# Altium PCB NewTrackerBoard.PcbDoc (part 1 of 4)
Units mm, origin at the board's own origin, x right, y up, seen from the top; angles counter-clockwise.
Board outline 47 x 47 mm, 4 copper layers (L1 (SIG), L2 (GND), L3 (GND), L4 (SIG + PWR)), stack 1.566 mm thick; 77 components, 57 nets, 308 pads, 297 vias.
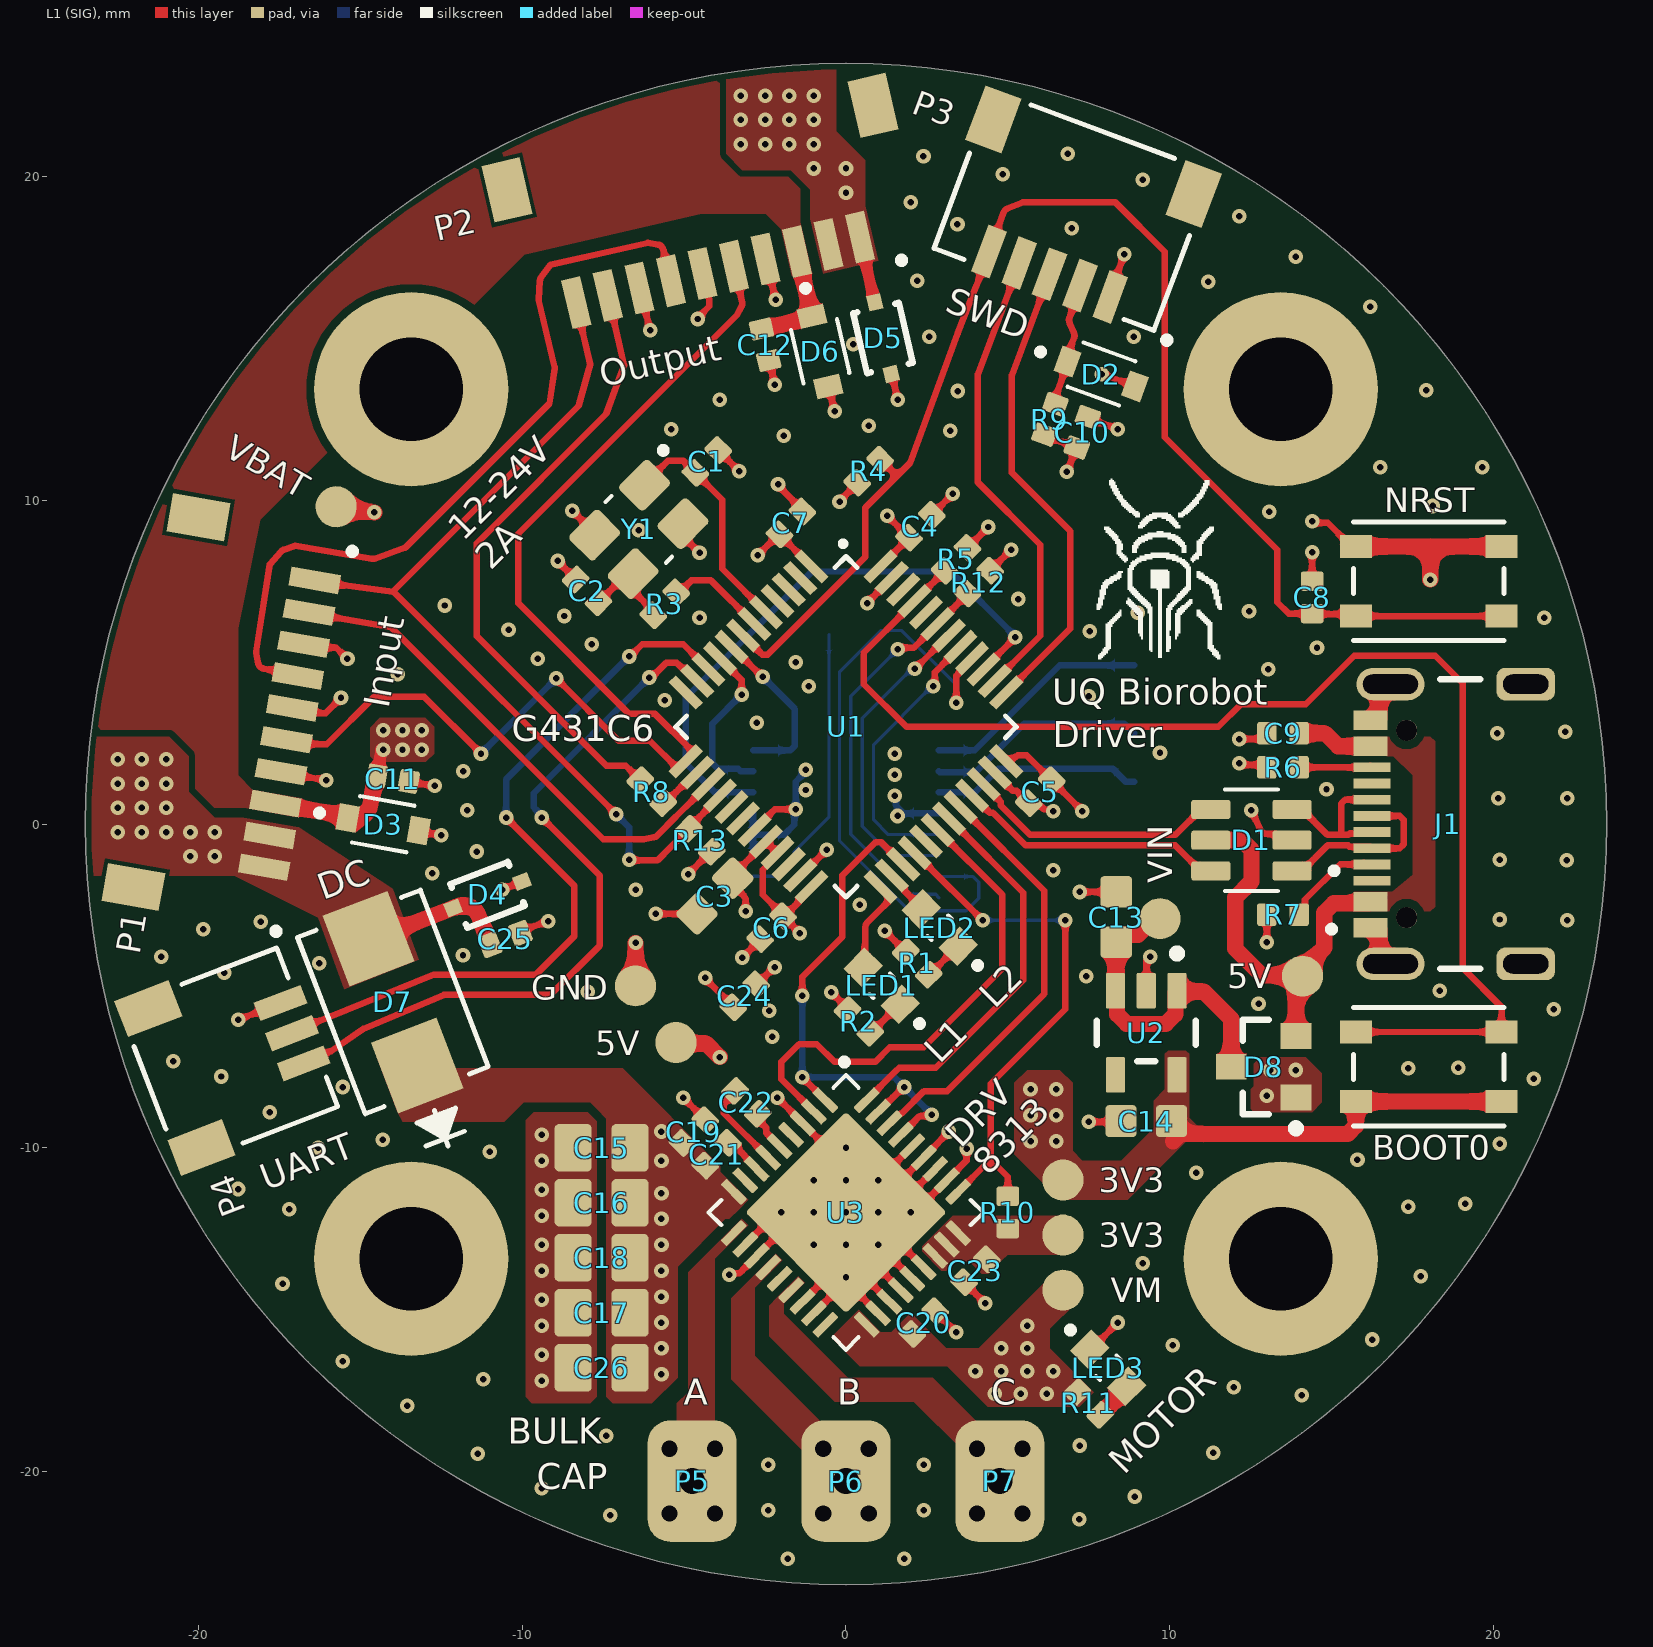
[diagram p0: L1 (SIG) view]
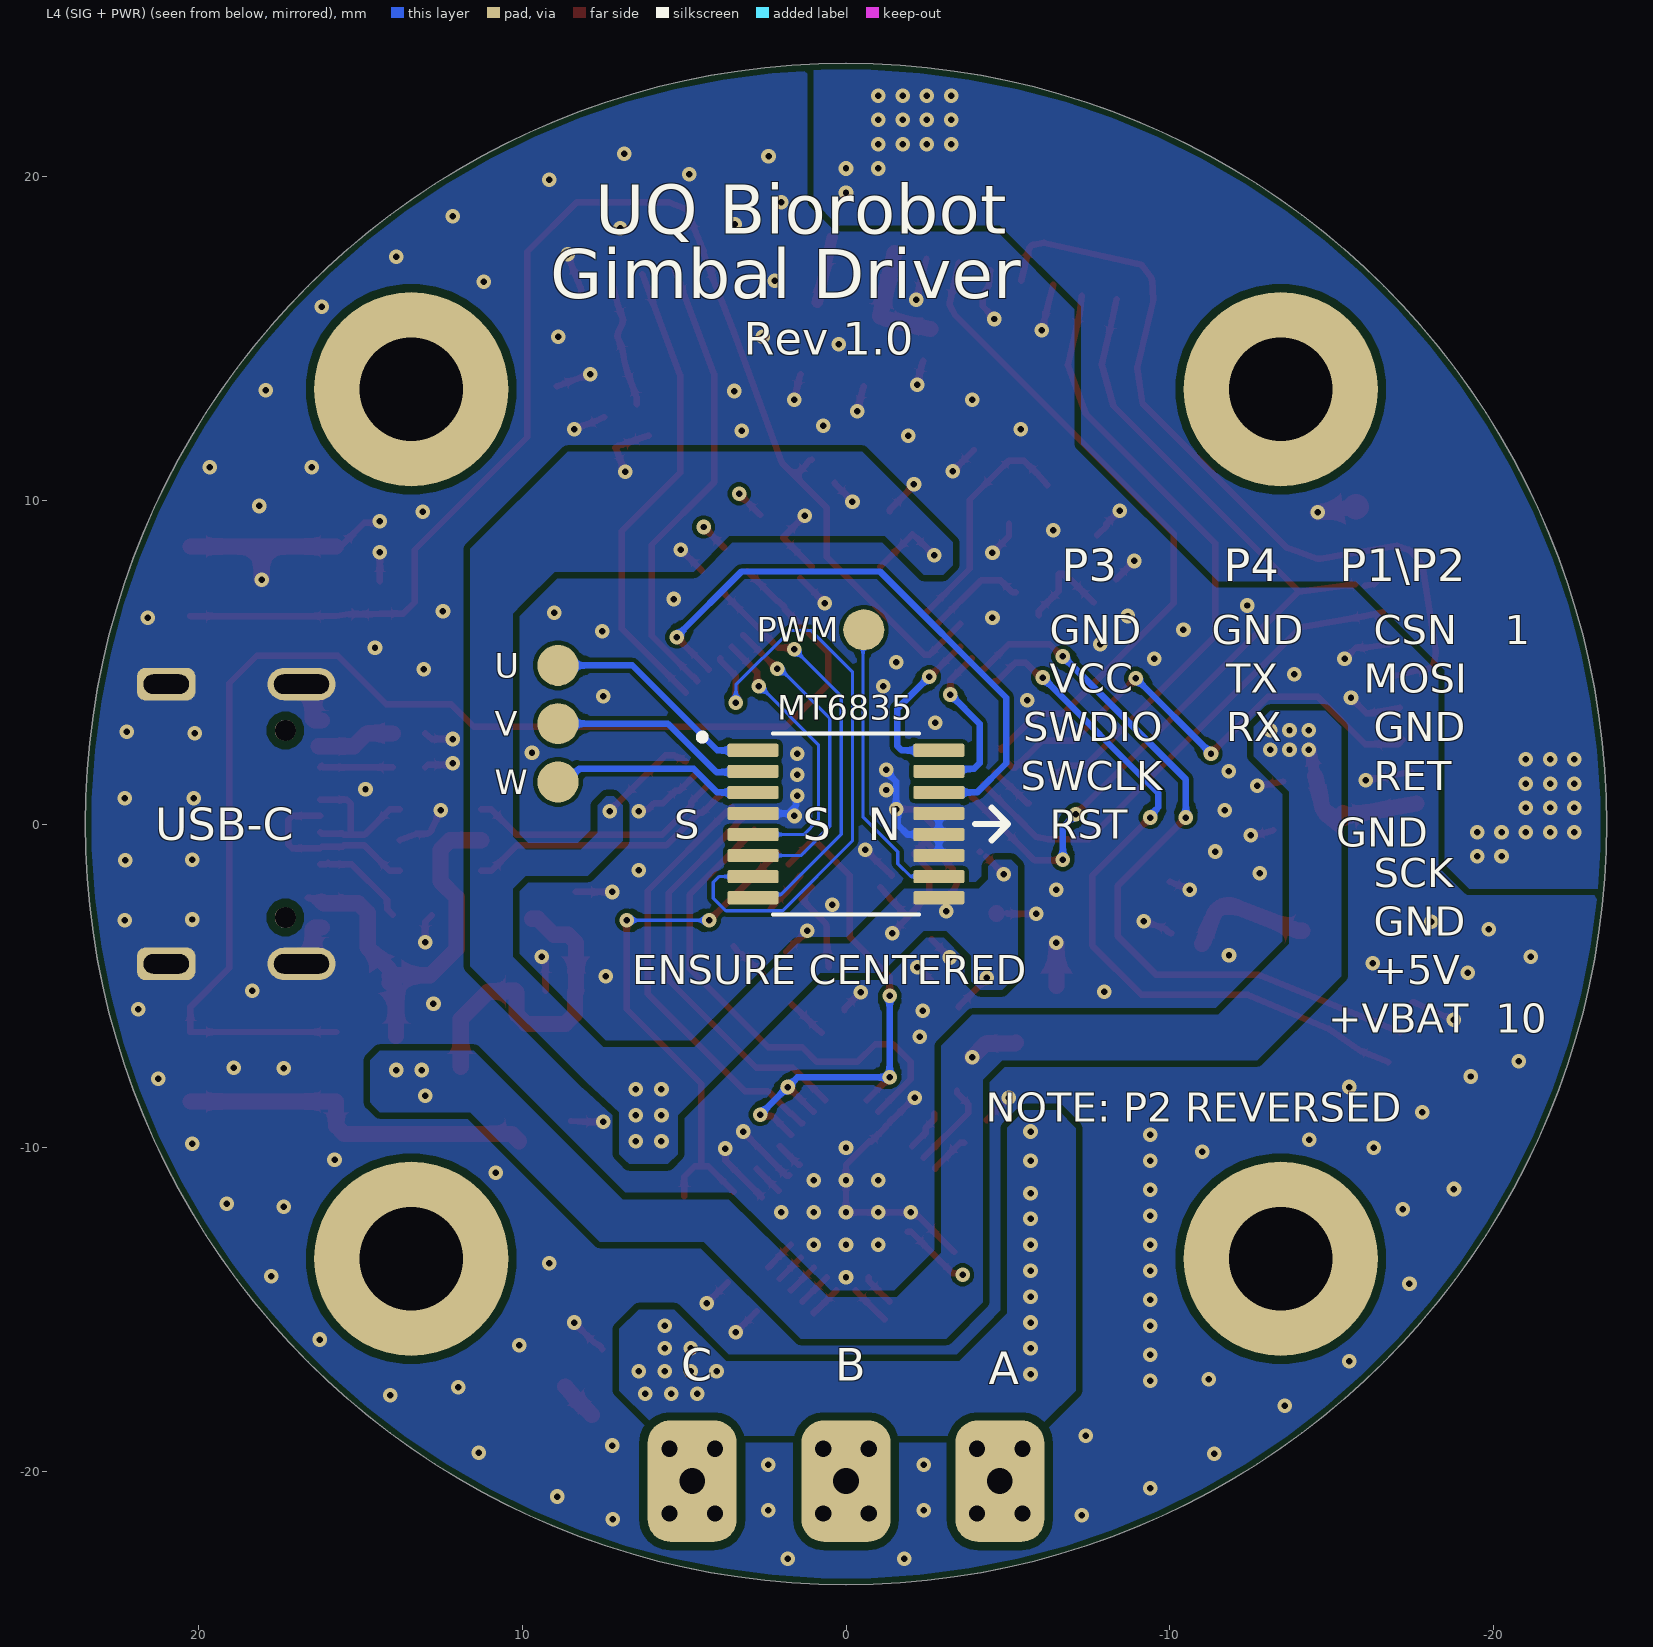
[diagram p1: L4 (SIG + PWR) view, seen from below]
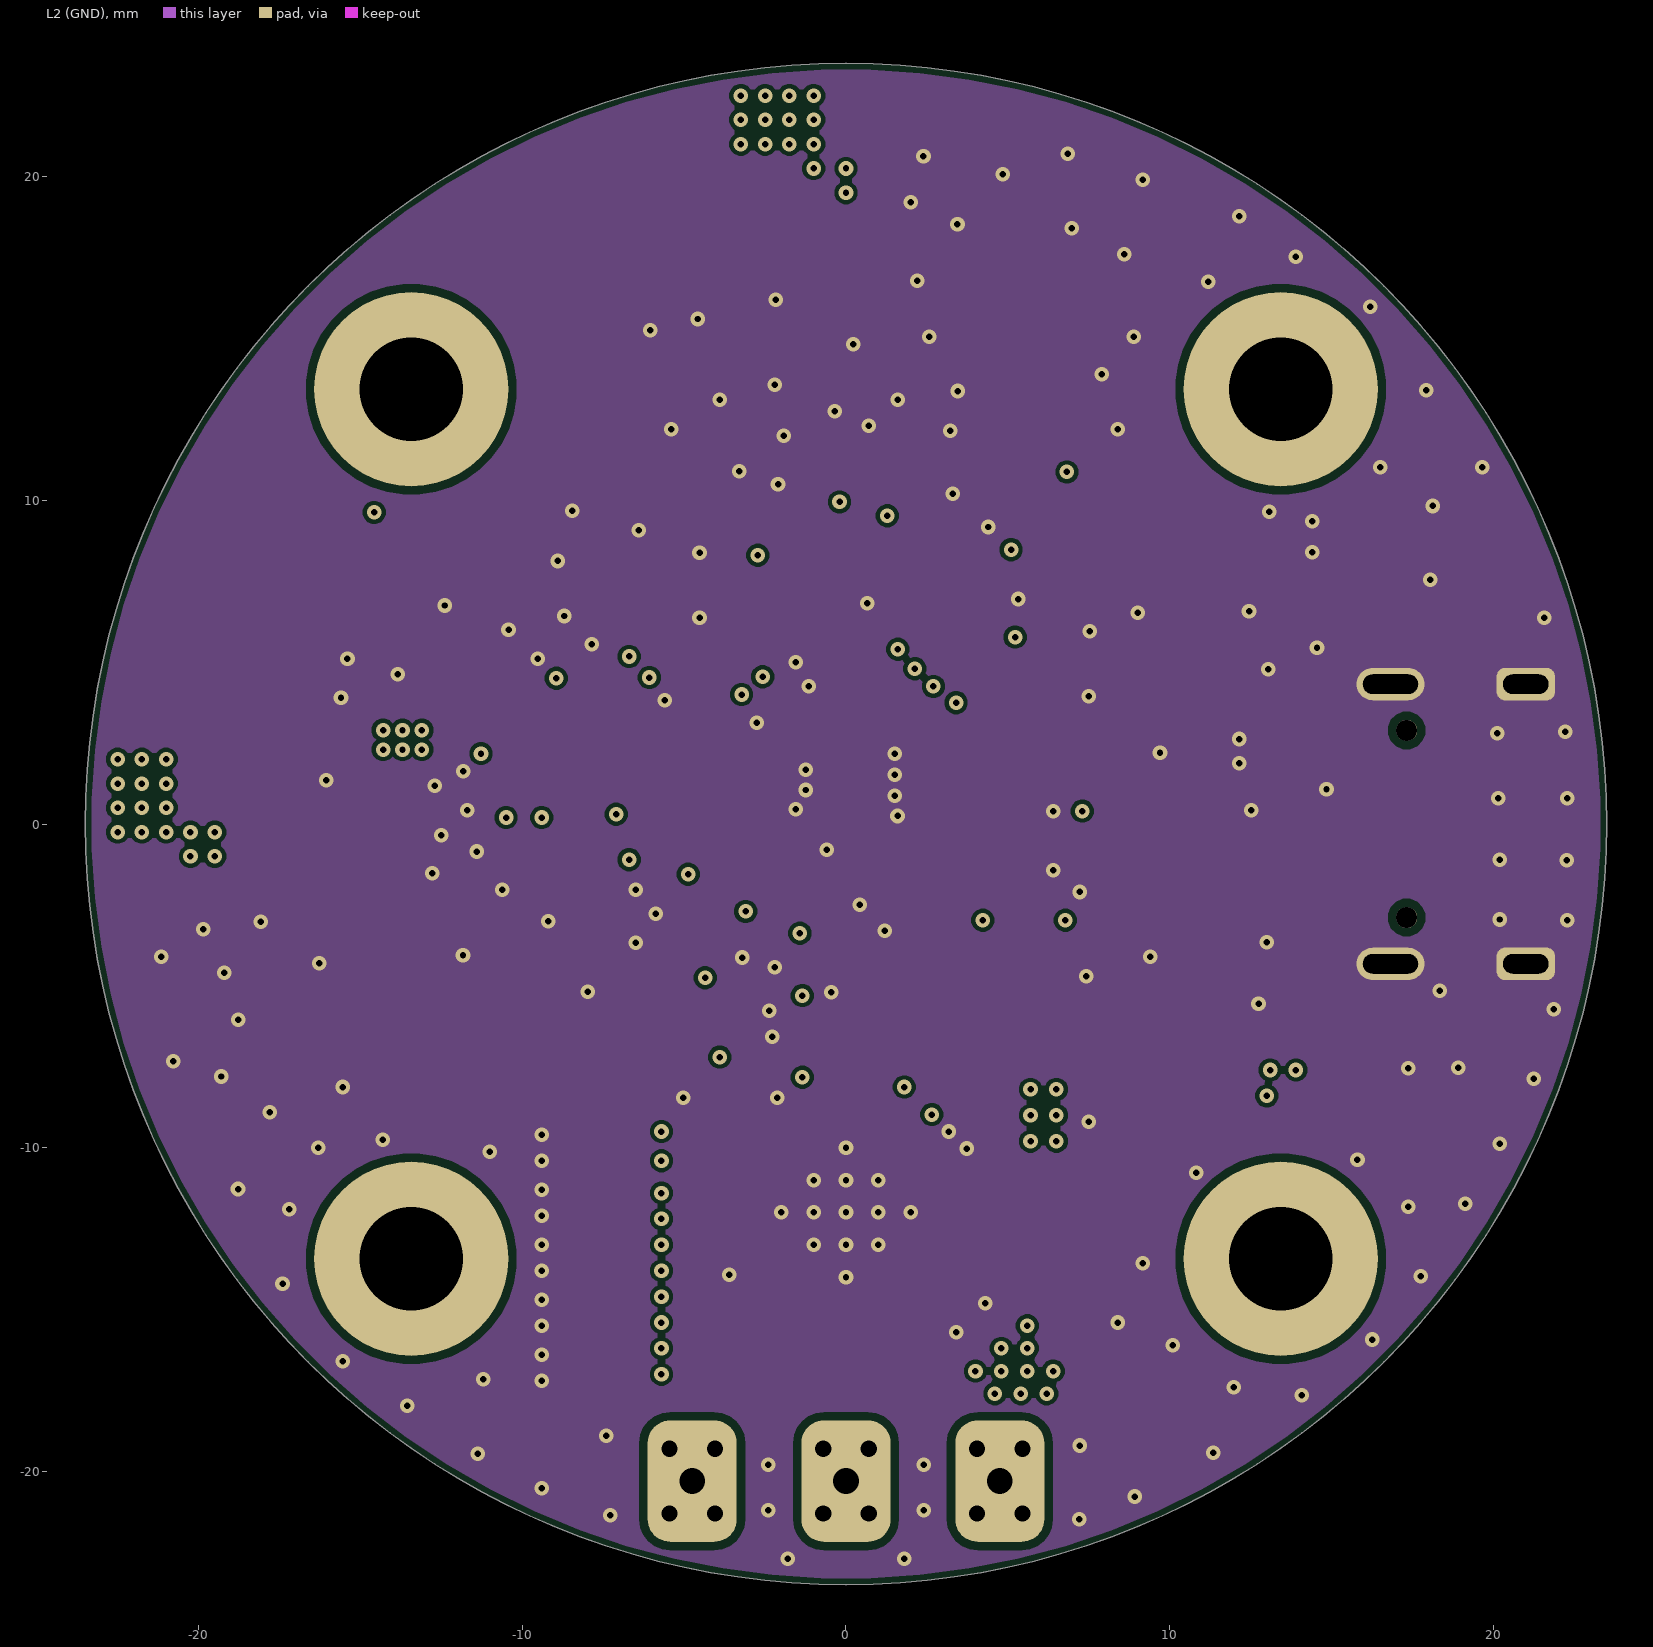
[diagram p2: L2 (GND)]
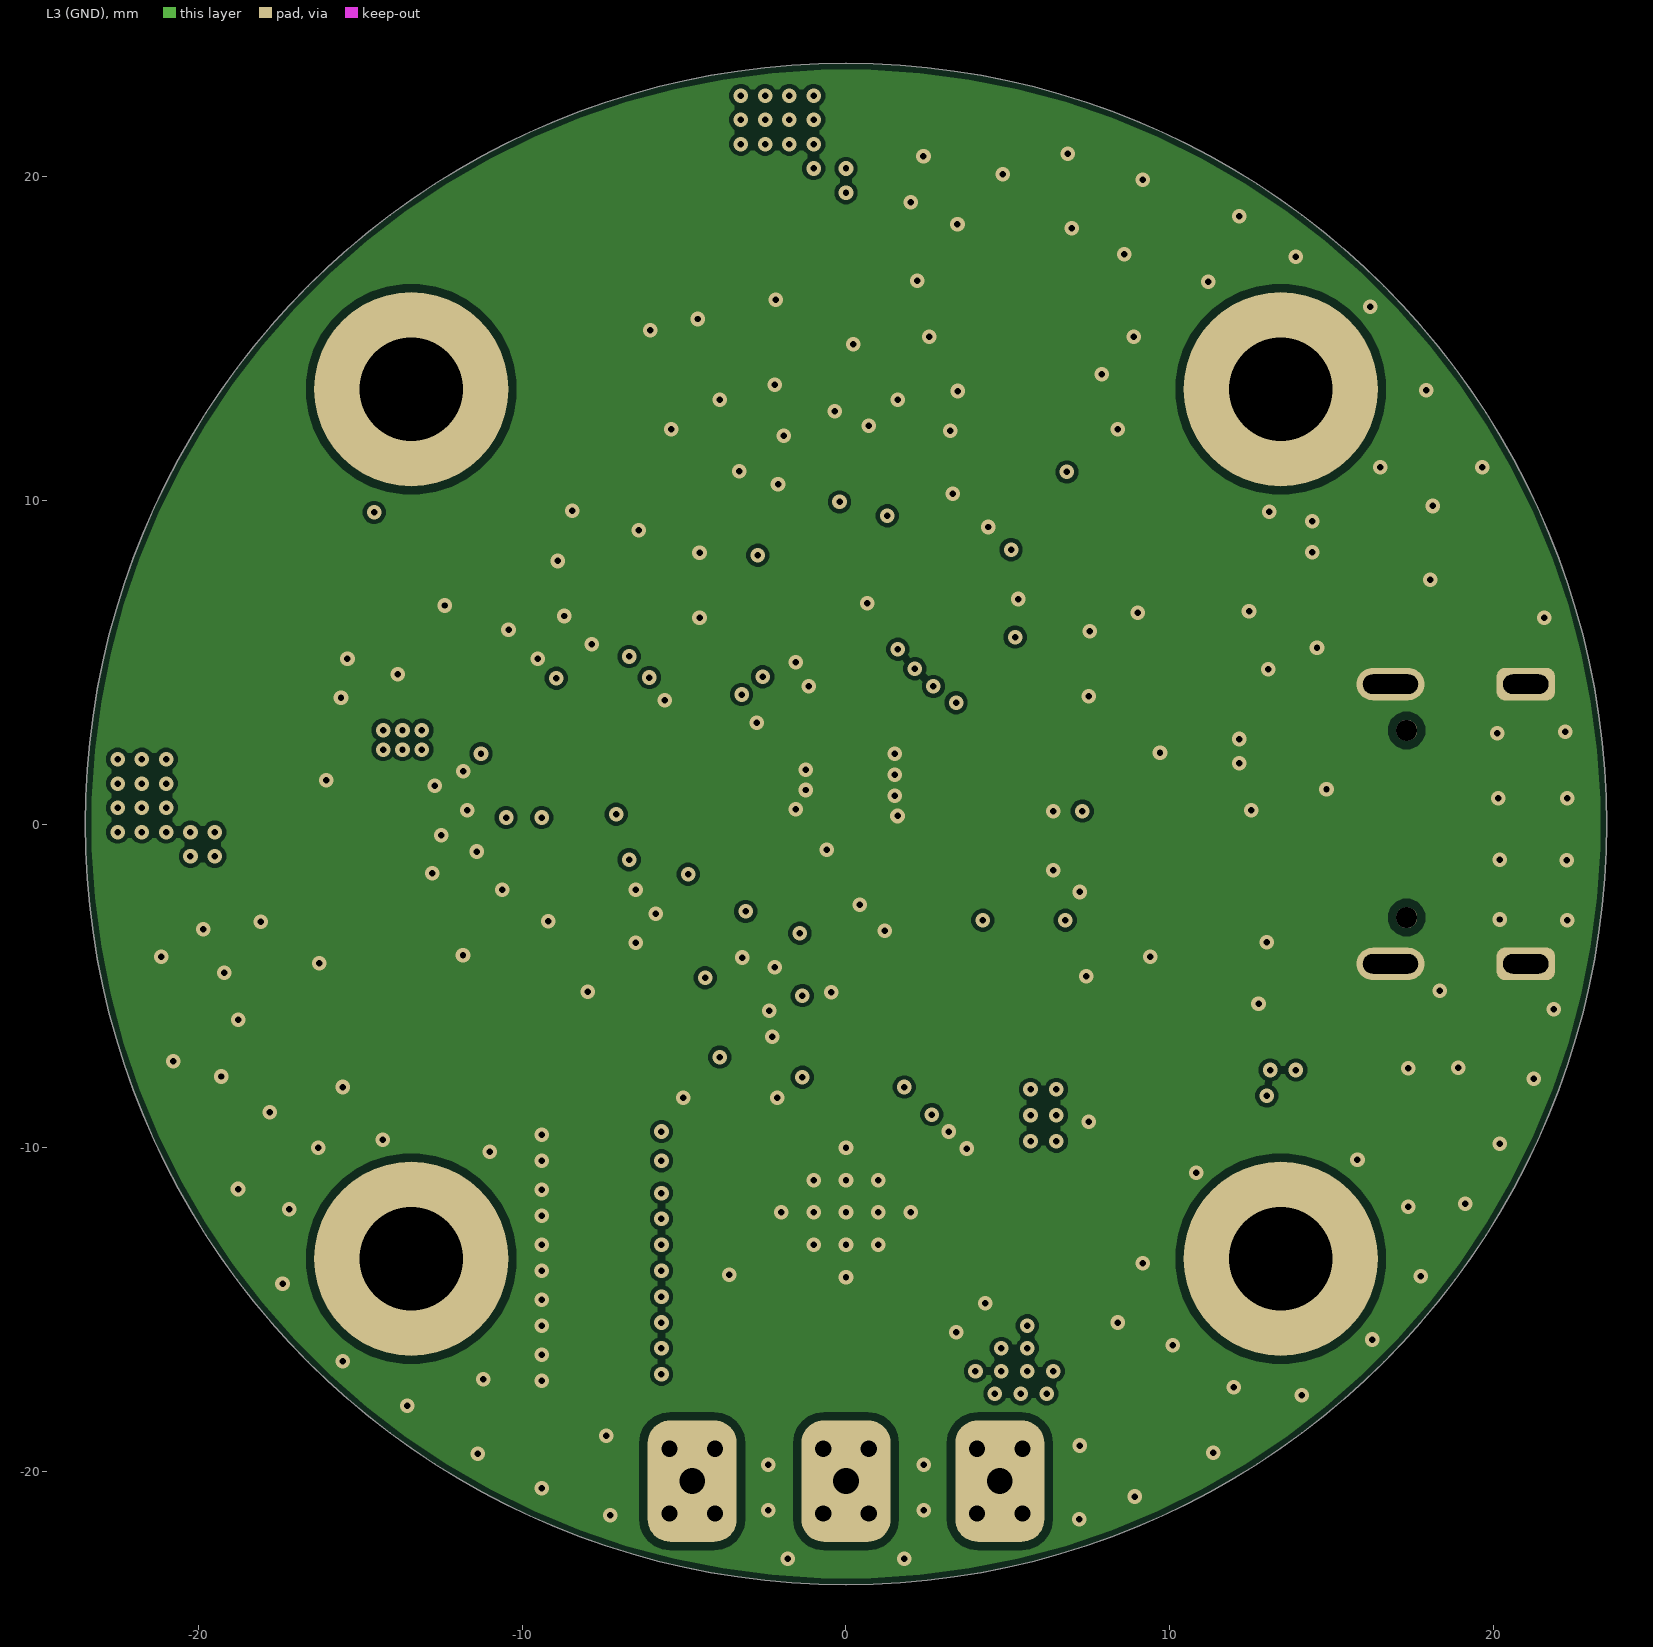
[diagram p3: L3 (GND)]
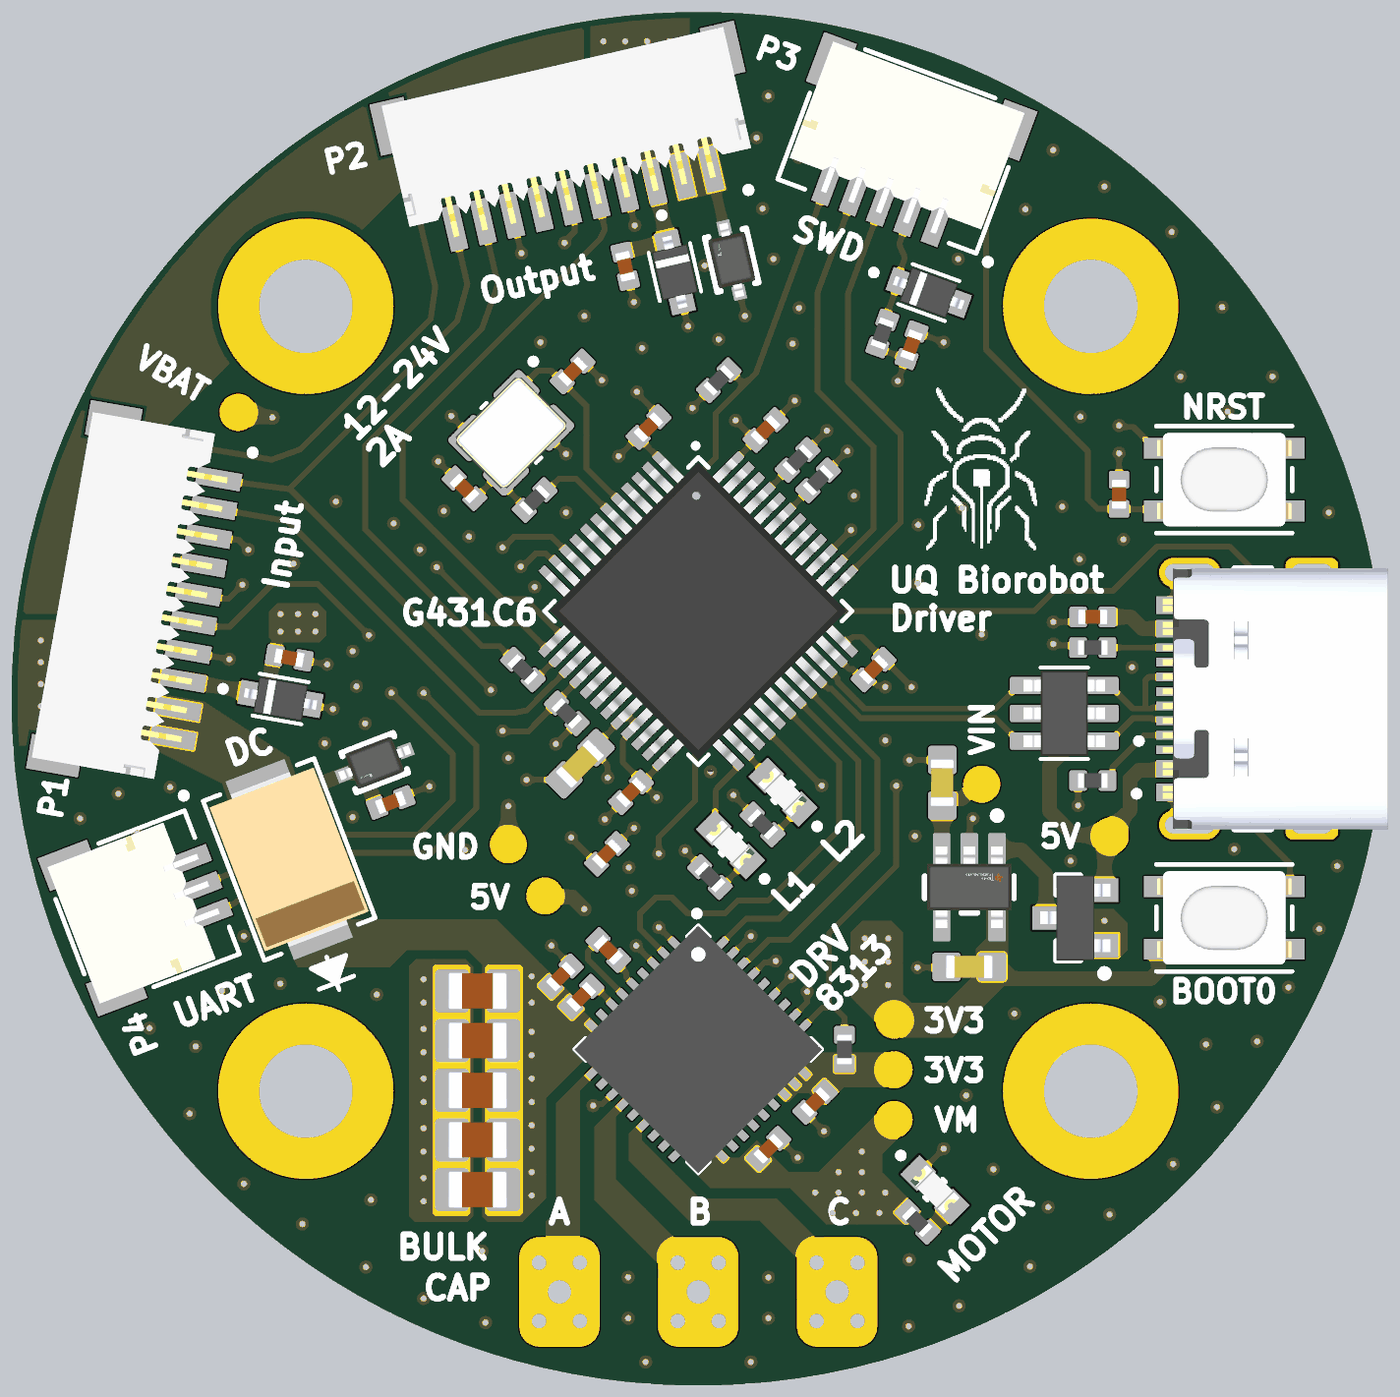
[diagram p5: 3D render of the assembled board from above, using the file's embedded part models]

## Layer stack, top to bottom
Top Solder: solder mask 0.0254, SM-001, Dk 4
L1 (SIG): signal copper 0.035
Dielectric 1: prepreg 0.203, PP-017, Dk 4.4
L2 (GND): signal copper 0.03
Dielectric 3: core 1.03, Core-039, Dk 4.6
L3 (GND): signal copper 0.03
Dielectric 5: prepreg 0.203, PP-017, Dk 4.4
L4 (SIG + PWR): signal copper 0.035
Bottom Solder: solder mask 0.0254, SM-001, Dk 4

## Board outline
0,-23.5 cw(c0,0) -23.5,0 cw(c0,0) 0,23.5 cw(c0,0) 23.5,0 cw(c0,0)

## Design rules (kind name [scope] priority, off if disabled: settings)
BoardOutlineClearance [All] p1: gap=0.2 ignorepadtopadclearanceinfootprint=FALSE
Clearance [All] p1: gap=0.127 ignorepadtopadclearanceinfootprint=FALSE except(0.102: Arc-Text Track-Text SMDPad-Text THPad-Text Fill-Text Poly-Text Region-Text Text-Text; 0.12: Arc-Arc Arc-Track Track-Track; 0.15: Arc-SMDPad Arc-Via Track-SMDPad Track-Via SMDPad-SMDPad SMDPad-THPad THPad-THPad; 0.2: Arc-THPad Track-THPad Fill-Fill Fill-Poly Fill-Region Poly-Poly Poly-Region Region-Region; 0.25: Arc-Hole Track-Hole SMDPad-Hole THPad-Fill THPad-Poly THPad-Region THPad-Hole Via-Hole Fill-Hole Poly-Hole Region-Hole Text-Hole)
DiffPairsRouting [InDifferentialPairClass('USBCONN_DIFF')] p1: maxlimit=0.127 minlimit=0.102 mostfreqgap=0.127 toplayer_mingap=0.127 toplayer_minwidth=0.2 toplayer_maxwidth=0.2 toplayer_prefwidth=0.2 bottomlayer_mingap=0.127 bottomlayer_minwidth=0.2 bottomlayer_maxwidth=0.2 bottomlayer_prefwidth=0.2 impedanceprofiledriven=TRUE impedanceprofileid={932FF260-EC21-4B35-A267-CE89872E64CB} impedanceprofilevalue=90.000000 maxuncoupledlength=12.7
HoleSize [All] p1: absolutevalues=TRUE maxlimit=6.3 minlimit=0.2 maxpercent=80.000 minpercent=20.000
HoleToHoleClearance [All] p1: gap=0.25 allowstackedmicrovias=FALSE
MinimumAnnularRing [All] p1: minimumring=0.12
MinimumSolderMaskSliver [All] p1: minsoldermaskwidth=0.1
PlaneClearance [All] p1: clearance=0.15
PlaneConnect PlaneConnectPowerPads [InPadClass('PowerPads')] p1: planeconnectstyle=Direct reliefexpansion=0.508 reliefentries=4 reliefconductorwidth=0.254 reliefairgap=0.254
PlaneConnect [All] p2: planeconnectstyle=Direct reliefexpansion=0.3 reliefentries=4 reliefconductorwidth=1 reliefairgap=0.102
PolygonConnect PolygonConnectPowerPads [All vs (InPadClass('PowerPads'))] p1: connectstyle=Direct reliefconductorwidth=0.254 reliefentries=4 polygonreliefangle="90 Angle" airgapwidth=0.254
PolygonConnect [All] p2: connectstyle=Direct reliefconductorwidth=0.5 reliefentries=4 polygonreliefangle="90 Angle" airgapwidth=0.102
RoutingVias [All] p1: holewidth=0.2 width=0.45 viastyle="Through Hole" minholewidth=0.2 minwidth=0.45 maxholewidth=0.2 maxwidth=0.45
SilkToSilkClearance [All] p1: silktosilkclearance=0
SilkToSolderMaskClearance [IsPad] p1: minsilkscreentomaskgap=0.102 clearancetoexposedcopper=TRUE
SolderMaskExpansion [All] p1: expansion=0.075 istentingtop=FALSE
Width [All] p1: maxlimit=0.8 minlimit=0.102 preferedwidth=0.2 minimp=50.000000 maximp=50.000000 favimp=50.000000
22 further rules are at their usual default settings.

## Classes and differential pairs
component class U_Mechanical: H1 H2 H3 H4 HW1 HW2 HW3 HW4 HW5 HW6 HW7 HW8 HW9 HW10 HW11 HW12 P8 P9 P10 P11 P12 P13
differential pair class USBCONN_DIFF: USB USBCONN
component class U_Power: 5V C13 C14 C25 D3V3 D7 D8 GND U2 VBAT VIN VM
component class U_Peripherals: C9 C10 C11 C12 D1 D2 D3 D4 D5 D6 J1 P1 P2 P3 P4 P5 P6 P7 R6 R7 R9
component class U_MCU_Core: BOOT0 C1 C2 C3 C4 C5 C6 C7 C8 LED1 LED2 NRST R1 R2 R3 R4 R5 R8 R13 U1 Y1
component class U_Encoder: C24 MT6835 PWM R12 U V W
component class U_Driver: C15 C16 C17 C18 C19 C20 C21 C22 C23 C26 D3V3 LED3 R10 R11 U3
differential pair USB: +USB_P -USB_N
differential pair USBCONN: +USBCONN_P -USBCONN_N

## Components (designator, comment, footprint, x,y, rotation, side; value= is the part's Value field where it differs from the comment)
3V3 "50mil TEST_PAD" 15mil_TEST_PAD 6.7,-12.7 r0 top (schematic designator TP7)
3V3 "50mil TEST_PAD" 15mil_TEST_PAD 6.7,-11 r180 top (schematic designator TP5)
5V "50mil TEST_PAD" 15mil_TEST_PAD -5.25,-6.75 r0 top (schematic designator TP3)
5V "50mil TEST_PAD" 15mil_TEST_PAD 14.1,-4.7 r0 top (schematic designator TP1)
BOOT0 "SPST N.O. Button" "SW4_PTS815 SJM 250 SMTR LFS_CNK" 18,-7.5 r0 top (schematic designator SW2)
C1 "12pF" 0402_CAP -4.3,11.2 r225 top
C2 "12pF" 0402_CAP -8,7.2 r315 top
C3 "10uF" 0603_CAP -4.05,-2.225 r45 top
C4 "100nF" 0402_CAP 2.3,9.2 r225 top
C5 "100nF" 0402_CAP 6,1 r45 top
C6 "100nF" 0402_CAP -2.3,-3.2 r45 top
C7 "100nF" 0402_CAP -1.7,9.3 r225 top
C8 "100nF" 0402_CAP 14.4,7 r270 top
C9 "100nF" 0402_CAP 13.5,2.8 r0 top
C10 "100nF" 0402_CAP 7.3,12.1 r250 top
C11 "100nF" 0402_CAP -14,1.4 r170 top
C12 "100nF" 0402_CAP -2.5,14.8 r283 top
C13 "1uF" 0603_CAP 8.35,-2.875 r270 top
C14 "1uF" 0603_CAP 9.275,-9.175 r0 top
C15 "22uF" 0805_CAP -7.55,-10 r0 top
C16 "22uF" 0805_CAP -7.55,-11.7 r0 top
C17 "22uF" 0805_CAP -7.55,-15.1 r0 top
C18 "22uF" 0805_CAP -7.55,-13.4 r0 top
C19 "100nF" 0402_CAP -4.7,-9.5 r225 top
C20 "100nF" 0402_CAP 2.4,-15.4 r225 top
C21 "100nF" 0402_CAP -4,-10.2 r225 top
C22 "10nF" 0402_CAP -3.075,-8.6 r135 top
C23 "470nF" 0402_CAP 4,-13.8 r45 top
C24 "100nF" 0402_CAP -3.13,-5.308 r45 top
C25 "100nF" 0402_CAP -10.525,-3.55 r201 top
C26 "22uF" 0805_CAP -7.55,-16.8 r0 top
D1 "USBLC6-2SC6" SOT95P280X145-6N 12.525,-0.5 r180 top
D2 "SD05" DIO_MM3Z3V0T1G 7.888,13.9 r340 top
D3 "SD05" DIO_MM3Z3V0T1G -14.296,-0.007 r350 top
D4 "SD24C-01FTG" FP-SD-C-MFG -11.071,-2.19 r201 top
D5 "SD24C-01FTG" FP-SD-C-MFG 1.144,15.011 r103 top
D6 "SD05" DIO_MM3Z3V0T1G -0.8,14.6 r283 top
D7 "SSB44-E3/52T" DIODE_DO214AA_MBRS_VIS-M -14,-5.5 r111 top
D8 "BAT54CLT3G" ONSC-SOT-23-3-318-08_V 12.9,-7.5 r180 top
GND "50mil TEST_PAD" 15mil_TEST_PAD -6.5,-5 r90 top (schematic designator TP12)
J1 "USB2.0 16P USB-C Connector" USBC_GCT_USB4105-GF-A-060 20,0 r90 top
LED1 "GREEN" 0603_LED 1.1,-5 r135 top
LED2 "GREEN" 0603_LED 2.9,-3.2 r135 top
LED3 "GREEN" 0603_LED 8.1,-16.8 r315 top
MT6835 "MT6835GT-STD" MT6835GT-STD 0,0 r180 bottom (schematic designator U4)
NRST "PTS810SJM250SMTRLFS" "SW4_PTS815 SJM 250 SMTR LFS_CNK" 18,7.5 r180 top (schematic designator SW1)
P1 "SM10B-SRSS-TB" SM10B-SRSS-TB -19.5,3.5 r260 top
P2 "SM10B-SRSS-TB" SM10B-SRSS-TB -4.475,19.4 r193 top
P3 "SM05B-SRSS-TB" SM05B-SRSS-TB 7.025,18.95 r159.5 top
P4 "SM03B-SRSS-TB" SM03B-SRSS-TB -19.072,-7.214 r291 top
P5 "3x2.5mm SOLDER_PAD" SOLDER_PAD -4.75,-20.3 r0 top
P6 "3x2.5mm SOLDER_PAD" SOLDER_PAD 0,-20.3 r0 top
P7 "3x2.5mm SOLDER_PAD" SOLDER_PAD 4.75,-20.3 r0 top
PWM "50mil TEST_PAD" 15mil_TEST_PAD -0.55,6 r90 bottom (schematic designator TP11)
R1 "300R" 0402_RES 2.2,-4.3 r315 top
R2 "300R" 0402_RES 0.4,-6.1 r135 top
R3 "0R" 0402_RES -5.6,6.8 r45 top
R4 "10K" 0402_RES 0.7,10.9 r225 top
R5 "10K" 0402_RES 3.4,8.175 r225 top
R6 "5K1" 0402_RES 13.5,1.75 r180 top
R7 "5K1" 0402_RES 13.5,-2.8 r0 top
R8 "0R" 0402_RES -6,1 r135 top
R9 "0R" 0402_RES 6.3,12.5 r70 top
R10 "10K" 0402_RES 5,-12 r270 top
R11 "10K" 0402_RES 7.5,-17.9 r135 top
R12 "10K" 0402_RES 4.1,7.475 r225 top
R13 "10K" 0402_RES -4.5,-0.5 r135 top
U "50mil TEST_PAD" 15mil_TEST_PAD 8.9,4.9 r180 bottom (schematic designator TP8)
U1 "STM32G431C6T6" LQFP48-7X7MM 0,3 r315 top
U2 "TPS7A2033PDBVR" FP-DBV0005A-MFG 9.275,-6.45 r270 top
U3 "DRV8313RHHR" QFN50P600X600X90-37N 0,-12 r315 top
V "50mil TEST_PAD" 15mil_TEST_PAD 8.9,3.1 r180 bottom (schematic designator TP9)
VBAT "50mil TEST_PAD" 15mil_TEST_PAD -15.75,9.8 r340 top (schematic designator TP2)
VIN "50mil TEST_PAD" 15mil_TEST_PAD 9.7,-2.925 r0 top (schematic designator TP4)
VM "50mil TEST_PAD" 15mil_TEST_PAD 6.7,-14.4 r0 top (schematic designator TP6)
W "50mil TEST_PAD" 15mil_TEST_PAD 8.9,1.3 r90 bottom (schematic designator TP10)
Y1 "24MHz 9pF" OSCCC320X250X60 -6.4,9.1 r225 top

## Footprints (in the part's own frame and the unit in brackets; to place one, negate y for a bottom-side part, rotate by r counter-clockwise, add the part's x,y. Pads: shape width x height; smd on the part's side, far side on the other; paste and mask are expansions set on the pad)
15mil_TEST_PAD [mm]
  round 1.27 smd paste-2539.97 mask+0.051: 1(0,0)
0402_CAP [mm]
  rrect25% 0.6x0.7 smd paste+0 mask+0.051: 1(-0.5,0) 2(0.5,0)
  body extent -0.5,-0.25 0.5,0.25, height 0.55
0402_RES [mm]
  rrect25% 0.6x0.7 smd paste+0 mask+0.051: 1(-0.5,0) 2(0.5,0)
  body extent -0.5,-0.25 0.5,0.25, height 0.4
0603_CAP [mm]
  rrect25% 0.972x0.981 smd mask+0.051: 1(-0.78,0) 2(0.78,0)
  body extent -0.8,-0.4 0.8,0.4, height 0.9
0603_LED [mm]
  rect 0.81x0.93 smd: A(0.81,0) C(-0.81,0)
  silkscreen extent -1.75,-0.45 0.09,0.45, body extent -0.8,-0.4 0.8,0.4, height 0.65
0805_CAP [mm]
  rrect25% 1.15x1.47 smd mask+0.051: 1(-0.88,0) 2(0.88,0)
  body extent -1,-0.63 1,0.63, height 1.45
DIO_MM3Z3V0T1G [mm]
  rect 0.625x0.83 smd: A(1.113,0) K(-1.113,0)
  silkscreen extent -2.1,-0.73 0.85,0.73, body extent -1.25,-0.62 1.25,0.62, height 1
DIODE_DO214AA_MBRS_VIS-M [mil]
  rect 92x85 smd paste+0 mask+0: A(82.68,0) C(-82.68,0)
  silkscreen extent -188,-80 115,80, body extent -110,-75 110,75, height 96
FP-DBV0005A-MFG [mm]
  rrect17% 1.1x0.6 smd paste+0 mask+0: 1(-1.3,0.95) 2(-1.3,0) 3(-1.3,-0.95) 4(1.3,-0.95) 5(1.3,0.95)
  silkscreen extent -2.57,-1.53 0.88,1.53, body extent -1.95,-1.78 1.95,1.78, height 0.25
FP-SD-C-MFG [mm]
  rect 0.49x0.45 smd paste+0 mask+0: 1(-1.14,0) 2(1.14,0)
  silkscreen extent -0.95,-0.72 0.95,0.73, body extent -1.49,-0.83 1.48,0.83, height 0.25
LQFP48-7X7MM [mm]
  rect 1.194x0.305 smd paste+0 mask+0.025: 1(-4.25,2.75) 2(-4.25,2.25) 3(-4.25,1.75) 4(-4.25,1.25) 5(-4.25,0.75) 6(-4.25,0.25) 7(-4.25,-0.25) 8(-4.25,-0.75) 9(-4.25,-1.25) 10(-4.25,-1.75) 11(-4.25,-2.25) 12(-4.25,-2.75) 25(4.25,-2.75) 26(4.25,-2.25) 27(4.25,-1.75) 28(4.25,-1.25) 29(4.25,-0.75) 30(4.25,-0.25) 31(4.25,0.25) 32(4.25,0.75) 33(4.25,1.25) 34(4.25,1.75) 35(4.25,2.25) 36(4.25,2.75)
  rect 0.305x1.194 smd paste+0 mask+0.025: 13(-2.75,-4.25) 14(-2.25,-4.25) 15(-1.75,-4.25) 16(-1.25,-4.25) 17(-0.75,-4.25) 18(-0.25,-4.25) 19(0.25,-4.25) 20(0.75,-4.25) 21(1.25,-4.25) 22(1.75,-4.25) 23(2.25,-4.25) 24(2.75,-4.25) 37(2.75,4.25) 38(2.25,4.25) 39(1.75,4.25) 40(1.25,4.25) 41(0.75,4.25) 42(0.25,4.25) 43(-0.25,4.25) 44(-0.75,4.25) 45(-1.25,4.25) 46(-1.75,4.25) 47(-2.25,4.25) 48(-2.75,4.25)
  silkscreen extent -4.14,-3.72 3.72,4.01, body extent -4.5,-4.5 4.5,4.5, height 1.6
MT6835GT-STD [mm]
  rrect25% 1.57x0.41 smd paste+0 mask+0.025: 1(-2.87,2.275) 2(-2.87,1.625) 3(-2.87,0.975) 4(-2.87,0.325) 5(-2.87,-0.325) 6(-2.87,-0.975) 7(-2.87,-1.625) 8(-2.87,-2.275) 9(2.87,-2.275) 10(2.87,-1.625) 11(2.87,-0.975) 12(2.87,-0.325) 13(2.87,0.325) 14(2.87,0.975) 15(2.87,1.625) 16(2.87,2.275)
  silkscreen extent -4.54,-2.8 5,2.8, body extent -3.15,-2.5 3.15,2.5, height 1
ONSC-SOT-23-3-318-08_V [mm] "SOT23, 3-Leads, Body 2.92x1.3mm, Pitch 0.95mm"
  rect 0.95x0.8 smd: 1(-1,0.95) 2(-1,-0.95) 3(1,0)
  silkscreen extent -1.13,-1.46 0.65,2.02, body extent -1.2,-1.45 1.2,1.45, height 1.11
OSCCC320X250X60 [mm]
  rrect25% 1.29x1.09 smd mask+0.051: 1(-1.09,-0.84) 2(1.09,-0.84) 3(1.09,0.84) 4(-1.09,0.84)
  silkscreen extent -2.36,-1.33 0.13,1.33, body extent -1.6,-1.25 1.6,1.25, height 0.6
QFN50P600X600X90-37N [mm]
  rrect25% 0.9x0.26 smd mask+0.051: 1(-2.9,2) 2(-2.9,1.5) 3(-2.9,1) 4(-2.9,0.5) 5(-2.9,0) 6(-2.9,-0.5) 7(-2.9,-1) 8(-2.9,-1.5) 9(-2.9,-2) 19(2.9,-2) 20(2.9,-1.5) 21(2.9,-1) 22(2.9,-0.5) 23(2.9,0) 24(2.9,0.5) 25(2.9,1) 26(2.9,1.5) 27(2.9,2)
  rrect25% 0.26x0.9 smd mask+0.051: 10(-2,-2.9) 11(-1.5,-2.9) 12(-1,-2.9) 13(-0.5,-2.9) 14(0,-2.9) 15(0.5,-2.9) 16(1,-2.9) 17(1.5,-2.9) 18(2,-2.9) 28(2,2.9) 29(1.5,2.9) 30(1,2.9) 31(0.5,2.9) 32(0,2.9) 33(-0.5,2.9) 34(-1,2.9) 35(-1.5,2.9) 36(-2,2.9)
  rrect5% 4.4x4.4 smd paste-3 mask+0.051: 37(0,0)
  silkscreen extent -3.42,-3 3,3.35, body extent -3,-3 3,3, height 1
SM03B-SRSS-TB [mil]
  rect 24x61 smd paste+0 mask+2: 1(-39.37,82.68) 2(0,82.68) 3(39.37,82.68)
  rect 47x71 smd mask+2: P-MOUNT1(-90.55,-69.88) P-MOUNT2(90.55,-69.88)
  silkscreen extent -126,-102 103,112, body extent -98,-97 98,98, height 116
SM05B-SRSS-TB [mil]
  rect 24x61 smd paste+0 mask+2: 1(-78.74,82.68) 2(-39.37,82.68) 3(0,82.68) 4(39.37,82.68) 5(78.74,82.68)
  rect 47x71 smd mask+2: P-MOUNT1(-129.92,-69.88) P-MOUNT2(129.92,-69.88)
  silkscreen extent -165,-102 143,111, body extent -138,-97 138,97, height 116
SM10B-SRSS-TB [mm]
  rect 0.6x1.55 smd mask+0.051: 1(-4.5,2.342) 2(-3.5,2.342) 3(-2.5,2.342) 4(-1.5,2.342) 5(-0.5,2.342) 6(0.5,2.342) 7(1.5,2.342) 8(2.5,2.342) 9(3.5,2.342) 10(4.5,2.342)
  rect 1.2x1.8 smd mask+0.051: P-MOUNT1(-5.8,-1.533) P-MOUNT2(5.8,-1.533)
  silkscreen extent -5.66,3.25 -5.51,3.41, body extent -6,-2.3 6,2.65, height 2.97
SOLDER_PAD [mm]
  round 0.9 hole 0.5 mask+0: 1(-0.7,-1) 1(-0.7,1) 1(0.7,-1) 1(0.7,1)
  rrect50% 2.75x3.75 hole 0.8 mask+0.051: 1(0,0)
SOT95P280X145-6N [mm]
  rrect25% 1.21x0.59 smd mask+0.051: 1(-1.255,0.95) 2(-1.255,0) 3(-1.255,-0.95) 4(1.255,-0.95) 5(1.255,0) 6(1.255,0.95)
  silkscreen extent -2.66,-1.57 0.81,1.57, body extent -1.4,-1.46 1.4,1.46, height 1.42
"SW4_PTS815 SJM 250 SMTR LFS_CNK" [mm]
  rect 0.991x0.711 smd paste+0 mask+0.051: 1(-2.25,1.075) 2(2.25,1.075) 3(-2.25,-1.075) 4(2.25,-1.075)
  silkscreen extent -2.32,-1.83 2.32,1.83, body extent -2.3,-1.6 2.3,1.6, height 2.7
USBC_GCT_USB4105-GF-A-060 [mm]
  rect 0.6x1.05 smd paste+0 mask+0.025: A1_B12(-3.2,3.805) A4_B9(-2.4,3.805) B1_A12(3.2,3.805) B4_A9(2.4,3.805)
  rect 0.3x1.15 smd paste+0 mask+0.025: A5(-1.25,3.755) A6(-0.25,3.755) A7(0.25,3.755) A8(1.25,3.755) B5(1.75,3.755) B6(0.75,3.755) B7(-0.75,3.755) B8(-1.75,3.755)
  oval 1x2.1 hole 0.6 slot 1.7 at 90 deg: SH1(-4.32,3.18) SH2(4.32,3.18)
  rrect50% 1x1.8 hole 0.6 slot 1.4 at 90 deg: SH3(-4.32,-1) SH4(4.32,-1)
  round 0.65 hole 0.65 unplated mask+0: ""(-2.89,2.68) ""(2.89,2.68)
  silkscreen extent -4.47,0.4 4.47,5.1, body extent -4.47,-3.6 4.47,4.11, height 3.31

## Part data
3V3 3V3 5V 5V GND PWM U V VBAT VIN VM W: library part "15mil TEST_PAD"
BOOT0: library part PTS810SJM250SMTRLFS, "Switch Tactile N.O. SPST Button J-Bend 0.05A 16V 150000Cycles 1.569N SMD T/R", Case/Package=SMD/SMT, Color=Black, Contact Current Rating=50mA, Contact Resistance=500mΩ, Insulation Resistance=100MΩ, Manufacturer="C&K Components", Max Operating Temperature=85°C, Max Voltage Rating (DC)=16V, Min Operating Temperature=-40°C, Operating Force=1.57N, Actuator Length=711.2µm, Category="Tactile Switches", ComponentLink1Description=https://datasheet.octopart.com:443/PTS810SJM250SMTRLFS-C%26K-Components-datasheet-180017475.pdf?src-supplier=IHS, ComponentLink1URL=https://datasheet.octopart.com:443/PTS810SJM250SMTRLFS-C%26K-Components-datasheet-180017475.pdf?src-supplier=IHS, ComponentLink2Description=https://datasheet.octopart.com:443/PTS810SJM250SMTRLFS-C%26K-Components-datasheet-67873722.pdf?src-supplier=Upverter, ComponentLink2URL=https://datasheet.octopart.com:443/PTS810SJM250SMTRLFS-C%26K-Components-datasheet-67873722.pdf?src-supplier=Upverter, ComponentLink3Description=https://datasheet.octopart.com:443/PTS810-SJM-250-SMTR-LFS-C%26K-Components-datasheet-41562126.pdf?src-supplier=Upverter, ComponentLink3URL=https://datasheet.octopart.com:443/PTS810-SJM-250-SMTR-LFS-C%26K-Components-datasheet-41562126.pdf?src-supplier=Upverter, ComponentLink4Description=https://datasheet.octopart.com:443/PTS810SJM250SMTR-LFS-C%26K-Components-datasheet-181955281.pdf?src-supplier=Farnell, ComponentLink4URL=https://datasheet.octopart.com:443/PTS810SJM250SMTR-LFS-C%26K-Components-datasheet-181955281.pdf?src-supplier=Farnell, ComponentLink5Description=https://datasheet.octopart.com:443/PTS810SJM250SMTRLFS-C%26K-Components-datasheet-134606748.pdf?src-supplier=TME, ComponentLink5URL=https://datasheet.octopart.com:443/PTS810SJM250SMTRLFS-C%26K-Components-datasheet-134606748.pdf?src-supplier=TME, ComponentLink6Description=https://datasheet.octopart.com:443/PTS810-SJM-250-SMTR-LFS-C%26K-Components-datasheet-151508687.pdf?src-supplier=TME, ComponentLink6URL=https://datasheet.octopart.com:443/PTS810-SJM-250-SMTR-LFS-C%26K-Components-datasheet-151508687.pdf?src-supplier=TME, ComponentLink7Description=http://sigma.octopart.com:80/reach_statement/ITT-company-18.pdf?src-supplier=Compliance+Statements, ComponentLink7URL=http://sigma.octopart.com:80/reach_statement/ITT-company-18.pdf?src-supplier=Compliance+Statements, Contact Plating=Silver, Country of Origin="Mainland China", Current Rating=50mA, Depth=4.6mm, Electrical Life=150kcycles, Export Control Classification Number (ECCN) Code=EAR99, Harmonized Tariff Schedule (HTS) Code=8536.50.90.40, Height=1.8mm, Illumination Type=Non-Illuminated, Introduction Date=2013-03-04, Lead Free="Lead Free", Length=4.2mm, Life (Cycles)=150kcycles, Lifecycle Status=Production, Manufacturer Package Identifier=PTS810SJM250SMTRLFS, Manufacturer Part Number=PTS810SJM250SMTRLFS, Max Current Rating=50mA, Mechanical Life=150kcycles, Mount="Surface Mount", Number of Pins=4, Number of Positions=1, Orientation=Straight, Pricing 1="1=0.58, 10=0.501, 25=0.4672, 100=0.4173, 250=0.38652, 500=0.36488, 1000=0.34488 (USD)", REACH SVHC=Yes, RoHS=Compliant, Stock 1=70955, Supplier 1=DigiKey, Switch Function=Off-Mom, Switch Travel=150µm, Termination=Solder, Throw Configuration=SPST, Voltage Rating (DC)=16V
C1 C2: library part GJM1555C1H120FB01D, "12 pF, 50 V, ± 1%, C0G (NP0), 0402 [1005 Metric]", Case Code (Imperial)=0402, Case Code (Metric)=1005, Dielectric=C0G, Dielectric Material=Ceramic, Manufacturer=Murata, Manufacturer Lifecycle Status="IN PRODUCTION", Max Operating Temperature=125°C, Min Operating Temperature=-55°C, Supplier Part Number 1=490-11190-1-ND, Temperature Coefficient=30ppm/°C, Tolerance=±1%, Voltage Rating=50V, Capacitance=12pF, Case/Package=0402, Category="Ceramic Capacitors", ComponentLink1Description=https://datasheet.octopart.com:443/GJM1555C1H120FB01D-Murata-datasheet-165579666.pdf?src-supplier=TME, ComponentLink1URL=https://datasheet.octopart.com:443/GJM1555C1H120FB01D-Murata-datasheet-165579666.pdf?src-supplier=TME, ComponentLink2Description=https://datasheet.octopart.com:443/GJM1555C1H120FB01D-Murata-datasheet-12511495.pdf?src-supplier=TME, ComponentLink2URL=https://datasheet.octopart.com:443/GJM1555C1H120FB01D-Murata-datasheet-12511495.pdf?src-supplier=TME, ComponentLink3Description=https://datasheet.octopart.com:443/GJM1555C1H120FB01D-Murata-datasheet-141266224.pdf?src-supplier=Ciiva, ComponentLink3URL=https://datasheet.octopart.com:443/GJM1555C1H120FB01D-Murata-datasheet-141266224.pdf?src-supplier=Ciiva, ComponentLink4Description=https://datasheet.octopart.com:443/GJM1555C1H120FB01D-Murata-datasheet-140665264.pdf?src-supplier=Ciiva, ComponentLink4URL=https://datasheet.octopart.com:443/GJM1555C1H120FB01D-Murata-datasheet-140665264.pdf?src-supplier=Ciiva, ComponentLink5Description=https://datasheet.octopart.com:443/GJM1555C1H120FB01D-Murata-datasheet-138724487.pdf?src-supplier=Ciiva, ComponentLink5URL=https://datasheet.octopart.com:443/GJM1555C1H120FB01D-Murata-datasheet-138724487.pdf?src-supplier=Ciiva, ComponentLink6Description=https://datasheet.octopart.com/GJM1555C1H120FB01D-Murata-datasheet-12515295.pdf, ComponentLink6URL=https://datasheet.octopart.com/GJM1555C1H120FB01D-Murata-datasheet-12515295.pdf, ComponentLink7Description=https://datasheet.octopart.com/GJM1555C1H120FB01D-Murata-datasheet-12510076.pdf, ComponentLink7URL=https://datasheet.octopart.com/GJM1555C1H120FB01D-Murata-datasheet-12510076.pdf, ComponentLink8Description=https://datasheet.octopart.com/GJM1555C1H120FB01D-Murata-datasheet-11978611.pdf, ComponentLink8URL=https://datasheet.octopart.com/GJM1555C1H120FB01D-Murata-datasheet-11978611.pdf, ComponentLink9Description=https://datasheet.octopart.com/GJM1555C1H120FB01D-Murata-datasheet-10025737.pdf, ComponentLink9URL=https://datasheet.octopart.com/GJM1555C1H120FB01D-Murata-datasheet-10025737.pdf, ComponentLink10Description=https://datasheet.octopart.com/GJM1555C1H120FB01D-Murata-datasheet-8819587.pdf, ComponentLink10URL=https://datasheet.octopart.com/GJM1555C1H120FB01D-Murata-datasheet-8819587.pdf, ComponentLink11Description=https://datasheet.octopart.com/GJM1555C1H120FB01D-Murata-datasheet-14407173.pdf, ComponentLink11URL=https://datasheet.octopart.com/GJM1555C1H120FB01D-Murata-datasheet-14407173.pdf, ComponentLink12Description=http://sigma.octopart.com:80/reach_statement/Murata-company-16.pdf?src-supplier=Compliance+Statements, ComponentLink12URL=http://sigma.octopart.com:80/reach_statement/Murata-company-16.pdf?src-supplier=Compliance+Statements, Depth=500µm, Export Control Classification Number (ECCN) Code=EAR99, Harmonized Tariff Schedule (HTS) Code=8532.24.00.20, Height=500µm, Introduction Date=2013-11-20, Length=1mm, Lifecycle Status=Production, Manufacturer Part Number=GJM1555C1H120FB01D, Material=Ceramic, Mount="Surface Mount", Number of Terminals=2, Pricing 1="1=0.16, 10=0.089, 50=0.0628, 100=0.0546, 500=0.04104, 1000=0.03687, 2500=0.03246, 5000=0.02982 (USD)", Radiation Hardening=No, REACH SVHC=Yes, RoHS=Compliant, Schedule B="8532240020, 8532240020|8532240020|8532240020|8532240020|8532240020", Stock 1=7555649, Supplier 1=DigiKey, Termination=SMD/SMT, Thickness=500µm, Voltage Rating (DC)=50V, Width=500µm
C3: library part GRM188R61E106KA73J, "25V 10uF X7R ±10% 0603 Multilayer Ceramic Capacitors MLCC - SMD/SMT ROHS", Capacitance=10µF, Case/Package=0603, Dielectric=X5R, Dielectric Material=Ceramic, Manufacturer=Murata, Manufacturer Lifecycle Status="IN PRODUCTION", Max Operating Temperature=85°C, Min Operating Temperature=-55°C, Supplier Part Number 1=490-GRM188R61E106KA73JCT-ND, Tolerance=±10%, Voltage Rating=25V, Category="Ceramic Capacitors", ComponentLink1Description=https://datasheet.octopart.com:443/GRM188R61E106KA73J-Murata-datasheet-165579666.pdf?src-supplier=TME, ComponentLink1URL=https://datasheet.octopart.com:443/GRM188R61E106KA73J-Murata-datasheet-165579666.pdf?src-supplier=TME, ComponentLink2Description=https://datasheet.octopart.com:443/GRM188R61E106KA73J-Murata-datasheet-141274968.pdf?src-supplier=Ciiva, ComponentLink2URL=https://datasheet.octopart.com:443/GRM188R61E106KA73J-Murata-datasheet-141274968.pdf?src-supplier=Ciiva, ComponentLink3Description=https://datasheet.octopart.com:443/GRM188R61E106KA73J-Murata-datasheet-140704821.pdf?src-supplier=Ciiva, ComponentLink3URL=https://datasheet.octopart.com:443/GRM188R61E106KA73J-Murata-datasheet-140704821.pdf?src-supplier=Ciiva, ComponentLink4Description=https://datasheet.octopart.com:443/GRM188R61E106KA73J-Murata-datasheet-138742889.pdf?src-supplier=Ciiva, ComponentLink4URL=https://datasheet.octopart.com:443/GRM188R61E106KA73J-Murata-datasheet-138742889.pdf?src-supplier=Ciiva, ComponentLink5Description=https://datasheet.octopart.com/GRM188R61E106KA73J-Murata-datasheet-12515295.pdf, ComponentLink5URL=https://datasheet.octopart.com/GRM188R61E106KA73J-Murata-datasheet-12515295.pdf, ComponentLink6Description=https://datasheet.octopart.com/GRM188R61E106KA73J-Murata-datasheet-12510076.pdf, ComponentLink6URL=https://datasheet.octopart.com/GRM188R61E106KA73J-Murata-datasheet-12510076.pdf, ComponentLink7Description=https://datasheet.octopart.com/GRM188R61E106KA73J-Murata-datasheet-11978611.pdf, ComponentLink7URL=https://datasheet.octopart.com/GRM188R61E106KA73J-Murata-datasheet-11978611.pdf, ComponentLink8Description=https://datasheet.octopart.com/GRM188R61E106KA73J-Murata-datasheet-10025737.pdf, ComponentLink8URL=https://datasheet.octopart.com/GRM188R61E106KA73J-Murata-datasheet-10025737.pdf, ComponentLink9Description=https://datasheet.octopart.com/GRM188R61E106KA73J-Murata-datasheet-8819587.pdf, ComponentLink9URL=https://datasheet.octopart.com/GRM188R61E106KA73J-Murata-datasheet-8819587.pdf, ComponentLink10Description=http://sigma.octopart.com:80/reach_statement/Murata-company-16.pdf?src-supplier=Compliance+Statements, ComponentLink10URL=http://sigma.octopart.com:80/reach_statement/Murata-company-16.pdf?src-supplier=Compliance+Statements, Height=800µm, Length=1.6mm, Lifecycle Status=Production, Manufacturer Part Number=GRM188R61E106KA73J, Material=Ceramic, Mount="Surface Mount", Number of Terminals=2, Pricing 1="1=0.26, 10=0.149, 50=0.1072, 100=0.0945, 500=0.07304, 1000=0.06643, 2500=0.05947, 5000=0.05528 (USD)", REACH SVHC=Yes, RoHS=Compliant, Stock 1=170211, Supplier 1=DigiKey, Thickness=800µm, Voltage Rating (DC)=25V, Width=800µm
C4 C5 C6 C7 C8 C9 C10 C11 C12 C19 C20 C21 C24 C25: library part GCM155R71H104KE02J, "50V 100nF X7R ±10% 0402 Multilayer Ceramic Capacitors MLCC - SMD/SMT ROHS", Case Code (Imperial)=0402, Case Code (Metric)=1005, Dielectric=X7R, Dielectric Material=Ceramic, Manufacturer=Murata, Manufacturer Lifecycle Status="IN PRODUCTION", Max Operating Temperature=125°C, Min Operating Temperature=-55°C, Ratings=AEC-Q200, Supplier Part Number 1=490-14514-6-ND, Tolerance=±10%, Voltage Rating=50V, Capacitance=100nF, Category="Ceramic Capacitors", ComponentLink1Description=https://datasheet.octopart.com:443/GCM155R71H104KE02J-Murata-datasheet-155345015.pdf?src-supplier=Newark, ComponentLink1URL=https://datasheet.octopart.com:443/GCM155R71H104KE02J-Murata-datasheet-155345015.pdf?src-supplier=Newark, ComponentLink2Description=https://datasheet.octopart.com:443/GCM155R71H104KE02J-Murata-datasheet-178519985.pdf?src-supplier=Arrow.cn, ComponentLink2URL=https://datasheet.octopart.com:443/GCM155R71H104KE02J-Murata-datasheet-178519985.pdf?src-supplier=Arrow.cn, ComponentLink3Description=https://datasheet.octopart.com:443/GCM155R71H104KE02J-Murata-datasheet-141266224.pdf?src-supplier=Ciiva, ComponentLink3URL=https://datasheet.octopart.com:443/GCM155R71H104KE02J-Murata-datasheet-141266224.pdf?src-supplier=Ciiva, ComponentLink4Description=https://datasheet.octopart.com:443/GCM155R71H104KE02J-Murata-datasheet-140656751.pdf?src-supplier=Ciiva, ComponentLink4URL=https://datasheet.octopart.com:443/GCM155R71H104KE02J-Murata-datasheet-140656751.pdf?src-supplier=Ciiva, ComponentLink5Description=https://datasheet.octopart.com:443/GCM155R71H104KE02J-Murata-datasheet-138716456.pdf?src-supplier=Ciiva, ComponentLink5URL=https://datasheet.octopart.com:443/GCM155R71H104KE02J-Murata-datasheet-138716456.pdf?src-supplier=Ciiva, ComponentLink6Description=https://datasheet.octopart.com:443/GCM155R71H104KE02J-Murata-datasheet-77992203.pdf?src-supplier=Future+Electronics, ComponentLink6URL=https://datasheet.octopart.com:443/GCM155R71H104KE02J-Murata-datasheet-77992203.pdf?src-supplier=Future+Electronics, ComponentLink7Description=https://datasheet.octopart.com:443/GCM155R71H104KE02J-Murata-datasheet-12511495.pdf?src-supplier=TME, ComponentLink7URL=https://datasheet.octopart.com:443/GCM155R71H104KE02J-Murata-datasheet-12511495.pdf?src-supplier=TME, ComponentLink8Description=http://sigma.octopart.com:80/reach_statement/Murata-company-16.pdf?src-supplier=Compliance+Statements, ComponentLink8URL=http://sigma.octopart.com:80/reach_statement/Murata-company-16.pdf?src-supplier=Compliance+Statements, Country of Origin=Philippines, Export Control Classification Number (ECCN) Code=EAR99, Harmonized Tariff Schedule (HTS) Code=8532.24.00.20, Height=500µm, Introduction Date=2013-11-20, Length=1mm, Lifecycle Status=Production, Manufacturer Part Number=GCM155R71H104KE02J, Material=Ceramic, Mount="Surface Mount", Number of Terminals=2, Packaging="Tape & Reel (TR)", Pricing 1="1=0.1, 10=0.034, 50=0.0226, 100=0.0193, 500=0.01374, 1000=0.01205, 2500=0.01027, 5000=0.0092 (USD)", REACH SVHC=Yes, RoHS=Compliant, Schedule B="8532240020, 8532240020|8532240020, 8532240020|8532240020|8532240020, 8532240020|8532240020|8532240020|8532240020", Stock 1=13930662, Supplier 1=DigiKey, Termination=SMD/SMT, Voltage Rating (DC)=50V, Weight=6.010099mg, Width=500µm
  C4 C5 C6 C7 C8 C9 C10 C11 C12 C24 C25: Case/Package=0402
C13 C14: library part GCM188R71E105KA64D, "25V 1uF X7R ±10% 0603 Multilayer Ceramic Capacitors MLCC - SMD/SMT ROHS", Capacitance=1µF, Case Code (Imperial)=0603, Case Code (Metric)=1608, Dielectric=X7R, Dielectric Material=Ceramic, Manufacturer=Murata, Manufacturer Lifecycle Status="IN PRODUCTION", Max Operating Temperature=125°C, Min Operating Temperature=-55°C, Ratings=AEC-Q200, Supplier Part Number 1=490-10673-1-ND, Tolerance=±10%, Voltage=25V, Case/Package=0603, Category="Ceramic Capacitors", ComponentLink1Description=https://datasheet.octopart.com:443/GCM188R71E105KA64D-Murata-datasheet-39128443.pdf?src-supplier=Newark, ComponentLink1URL=https://datasheet.octopart.com:443/GCM188R71E105KA64D-Murata-datasheet-39128443.pdf?src-supplier=Newark, ComponentLink2Description=https://datasheet.octopart.com:443/GCM188R71E105KA64D-Murata-datasheet-62316951.pdf?src-supplier=element14+APAC, ComponentLink2URL=https://datasheet.octopart.com:443/GCM188R71E105KA64D-Murata-datasheet-62316951.pdf?src-supplier=element14+APAC, ComponentLink3Description=https://datasheet.octopart.com:443/GCM188R71E105KA64D-Murata-datasheet-141267554.pdf?src-supplier=Geoflip, ComponentLink3URL=https://datasheet.octopart.com:443/GCM188R71E105KA64D-Murata-datasheet-141267554.pdf?src-supplier=Geoflip, ComponentLink4Description=https://datasheet.octopart.com:443/GCM188R71E105KA64D-Murata-datasheet-140658666.pdf?src-supplier=Ciiva, ComponentLink4URL=https://datasheet.octopart.com:443/GCM188R71E105KA64D-Murata-datasheet-140658666.pdf?src-supplier=Ciiva, ComponentLink5Description=https://datasheet.octopart.com:443/GCM188R71E105KA64D-Murata-datasheet-138718232.pdf?src-supplier=Ciiva, ComponentLink5URL=https://datasheet.octopart.com:443/GCM188R71E105KA64D-Murata-datasheet-138718232.pdf?src-supplier=Ciiva, ComponentLink6Description=https://datasheet.octopart.com:443/GCM188R71E105KA64D-Murata-datasheet-81455541.pdf?src-supplier=TME, ComponentLink6URL=https://datasheet.octopart.com:443/GCM188R71E105KA64D-Murata-datasheet-81455541.pdf?src-supplier=TME, ComponentLink7Description=https://datasheet.octopart.com/GCM188R71E105KA64D-Murata-datasheet-14404430.pdf, ComponentLink7URL=https://datasheet.octopart.com/GCM188R71E105KA64D-Murata-datasheet-14404430.pdf, ComponentLink8Description=https://datasheet.octopart.com:443/GCM188R71E105KA64D-Murata-datasheet-14393380.pdf?src-supplier=Future+Electronics, ComponentLink8URL=https://datasheet.octopart.com:443/GCM188R71E105KA64D-Murata-datasheet-14393380.pdf?src-supplier=Future+Electronics, ComponentLink9Description=https://datasheet.octopart.com:443/GCM188R71E105KA64D-Murata-datasheet-44103482.pdf?src-supplier=Future+Electronics, ComponentLink9URL=https://datasheet.octopart.com:443/GCM188R71E105KA64D-Murata-datasheet-44103482.pdf?src-supplier=Future+Electronics, ComponentLink10Description=http://sigma.octopart.com:80/reach_statement/Murata-company-16.pdf?src-supplier=Compliance+Statements, ComponentLink10URL=http://sigma.octopart.com:80/reach_statement/Murata-company-16.pdf?src-supplier=Compliance+Statements, Country of Origin=Philippines, Depth=800µm, Export Control Classification Number (ECCN) Code=EAR99, Harmonized Tariff Schedule (HTS) Code=8532.24.00.20, Height=800µm, Introduction Date=2010-10-29, Lead Free="Lead Free", Length=1.6mm, Lifecycle Status=Production, Manufacturer Part Number=GCM188R71E105KA64D, Material=Ceramic, Mount="Surface Mount", Number of Terminals=2, Packaging="Cut Tape", Pricing 1="1=0.19, 10=0.106, 50=0.0752, 100=0.0658, 500=0.04994, 1000=0.04504 (USD)", Radiation Hardening=No, REACH SVHC=Yes, RoHS=Compliant, Schedule B="8532240020, 8532240020|8532240020, 8532240020|8532240020|8532240020, 8532240020|8532240020|8532240020|8532240020", Stock 1=751115, Supplier 1=DigiKey, Termination=SMD/SMT, Voltage Rating=25V, Voltage Rating (DC)=25V, Weight=6.293594mg, Width=800µm
C15 C16 C17 C18 C26: library part GMC21X5R226M35NT, "22uF Ceramic Capacitor, Multilayer, Ceramic, 35V, 20% +Tol, 20% -Tol, X5R, 15% TC, 22uF, Surface Mount, 0805", Dielectric=X5R, Dielectric Material=Ceramic, Manufacturer="Cal-Chip Electronics", Max Operating Temperature=85°C, Min Operating Temperature=-55°C, Supplier Part Number 1=4713-GMC21X5R226M35NTTR-ND, Tolerance=±20%, Voltage Rating=35V, Category="Ceramic Capacitors", China RoHS=Compliant, ComponentLink1Description=https://datasheet.octopart.com:443/GMC21X5R226M35NT-Cal-Chip-Electronics-datasheet-182028815.pdf?src-supplier=IHS, ComponentLink1URL=https://datasheet.octopart.com:443/GMC21X5R226M35NT-Cal-Chip-Electronics-datasheet-182028815.pdf?src-supplier=IHS, Country of Origin="Slovenia, South Korea, Taiwan", Export Control Classification Number (ECCN) Code=EAR99, Harmonized Tariff Schedule (HTS) Code=8532.24.00.20, Height=1.45mm, Introduction Date=2021-04-21, Length=2mm, Lifecycle Status=Production, Manufacturer Part Number=GMC21X5R226M35NT, Material=Ceramic, Mount="Surface Mount", Number of Terminals=2, Pricing 1="2000=0.22286, 4000=0.21143, 6000=0.20571, 10000=0.19936, 14000=0.19565, 20000=0.19208 (USD)", REACH SVHC=Yes, RoHS=Compliant, Stock 1=120000, Supplier 1=DigiKey, Voltage Rating (DC)=35V, Width=1.25mm
C22: library part GCM155R71H103KA55D, "50V 10nF X7R ±10% 0402 Multilayer Ceramic Capacitors MLCC - SMD/SMT ROHS", Case Code (Imperial)=0402, Case Code (Metric)=1005, Dielectric=X7R, Dielectric Material=Ceramic, Manufacturer=Murata, Manufacturer Lifecycle Status="IN PRODUCTION", Max Operating Temperature=125°C, Min Operating Temperature=-55°C, Ratings=AEC-Q200, Supplier Part Number 1=490-4762-6-ND, Tolerance=±10%, Voltage=50V, Capacitance=10nF, Case/Package=0402, Category="Ceramic Capacitors", ComponentLink1Description=https://datasheet.octopart.com:443/GCM155R71H103KA55D-Murata-datasheet-149522462.pdf?src-supplier=Farnell, ComponentLink1URL=https://datasheet.octopart.com:443/GCM155R71H103KA55D-Murata-datasheet-149522462.pdf?src-supplier=Farnell, ComponentLink2Description=https://datasheet.octopart.com:443/GCM155R71H103KA55D-Murata-datasheet-39128434.pdf?src-supplier=Newark, ComponentLink2URL=https://datasheet.octopart.com:443/GCM155R71H103KA55D-Murata-datasheet-39128434.pdf?src-supplier=Newark, ComponentLink3Description=https://datasheet.octopart.com:443/GCM155R71H103KA55D-Murata-datasheet-62316942.pdf?src-supplier=element14+APAC, ComponentLink3URL=https://datasheet.octopart.com:443/GCM155R71H103KA55D-Murata-datasheet-62316942.pdf?src-supplier=element14+APAC, ComponentLink4Description=https://datasheet.octopart.com:443/GCM155R71H103KA55D-Murata-datasheet-12541648.pdf?src-supplier=_legacy+Avnet, ComponentLink4URL=https://datasheet.octopart.com:443/GCM155R71H103KA55D-Murata-datasheet-12541648.pdf?src-supplier=_legacy+Avnet, ComponentLink5Description=https://datasheet.octopart.com:443/GCM155R71H103KA55D-Murata-datasheet-14404350.pdf?src-supplier=Future+Electronics, ComponentLink5URL=https://datasheet.octopart.com:443/GCM155R71H103KA55D-Murata-datasheet-14404350.pdf?src-supplier=Future+Electronics, ComponentLink6Description=https://datasheet.octopart.com:443/GCM155R71H103KA55D-Murata-datasheet-44104302.pdf?src-supplier=Future+Electronics, ComponentLink6URL=https://datasheet.octopart.com:443/GCM155R71H103KA55D-Murata-datasheet-44104302.pdf?src-supplier=Future+Electronics, ComponentLink7Description=https://datasheet.octopart.com:443/GCM155R71H103KA55D-Murata-datasheet-141266224.pdf?src-supplier=Ciiva, ComponentLink7URL=https://datasheet.octopart.com:443/GCM155R71H103KA55D-Murata-datasheet-141266224.pdf?src-supplier=Ciiva, ComponentLink8Description=https://datasheet.octopart.com:443/GCM155R71H103KA55D-Murata-datasheet-140656749.pdf?src-supplier=Ciiva, ComponentLink8URL=https://datasheet.octopart.com:443/GCM155R71H103KA55D-Murata-datasheet-140656749.pdf?src-supplier=Ciiva, ComponentLink9Description=https://datasheet.octopart.com:443/GCM155R71H103KA55D-Murata-datasheet-138716454.pdf?src-supplier=Ciiva, ComponentLink9URL=https://datasheet.octopart.com:443/GCM155R71H103KA55D-Murata-datasheet-138716454.pdf?src-supplier=Ciiva, ComponentLink10Description=https://datasheet.octopart.com:443/GCM155R71H103KA55D-Murata-datasheet-12511495.pdf?src-supplier=TME, ComponentLink10URL=https://datasheet.octopart.com:443/GCM155R71H103KA55D-Murata-datasheet-12511495.pdf?src-supplier=TME, ComponentLink11Description=http://sigma.octopart.com:80/reach_statement/Murata-company-16.pdf?src-supplier=Compliance+Statements, ComponentLink11URL=http://sigma.octopart.com:80/reach_statement/Murata-company-16.pdf?src-supplier=Compliance+Statements, Country of Origin=Philippines, Depth=500µm, Export Control Classification Number (ECCN) Code=EAR99, Harmonized Tariff Schedule (HTS) Code=8532.24.00.20, Height=500µm, Introduction Date=2007-06-21, Lead Free="Lead Free", Length=1mm, Lifecycle Status=Production, Manufacturer Part Number=GCM155R71H103KA55D, Material=Ceramic, Mount="Surface Mount", Number of Terminals=2, Packaging="Cut Tape", Pricing 1="1=0.1, 10=0.026, 50=0.0172, 100=0.0146, 500=0.01026, 1000=0.00894, 2500=0.00756, 5000=0.00672 (USD)", Radiation Hardening=No, REACH SVHC=Yes, RoHS=Compliant, Schedule B="8532240020, 8532240020|8532240020, 8532240020|8532240020|8532240020, 8532240020|8532240020|8532240020|8532240020", Stock 1=3983526, Supplier 1=DigiKey, Termination=SMD/SMT, Voltage Rating=50V, Voltage Rating (DC)=50V, Width=500µm
C23: library part GRM155R61H474KE11D, "50V 470nF X5R ±10% 0402 Multilayer Ceramic Capacitors MLCC - SMD/SMT ROHS", Dielectric=X5R, Dielectric Material=Ceramic, Manufacturer=Murata, Manufacturer Lifecycle Status="IN PRODUCTION", Max Operating Temperature=85°C, Min Operating Temperature=-55°C, Supplier Part Number 1=490-16354-6-ND, Tolerance=±10%, Voltage Rating=50V, Category="Ceramic Capacitors", ComponentLink1Description=https://datasheet.octopart.com:443/GRM155R61H474KE11D-Murata-datasheet-149523035.pdf?src-supplier=Newark, ComponentLink1URL=https://datasheet.octopart.com:443/GRM155R61H474KE11D-Murata-datasheet-149523035.pdf?src-supplier=Newark, ComponentLink2Description=https://datasheet.octopart.com:443/GRM155R61H474KE11D-Murata-datasheet-165579666.pdf?src-supplier=TME, ComponentLink2URL=https://datasheet.octopart.com:443/GRM155R61H474KE11D-Murata-datasheet-165579666.pdf?src-supplier=TME, ComponentLink3Description=https://datasheet.octopart.com:443/GRM155R61H474KE11D-Murata-datasheet-141266224.pdf?src-supplier=Ciiva, ComponentLink3URL=https://datasheet.octopart.com:443/GRM155R61H474KE11D-Murata-datasheet-141266224.pdf?src-supplier=Ciiva, ComponentLink4Description=https://datasheet.octopart.com:443/GRM155R61H474KE11D-Murata-datasheet-140690652.pdf?src-supplier=Ciiva, ComponentLink4URL=https://datasheet.octopart.com:443/GRM155R61H474KE11D-Murata-datasheet-140690652.pdf?src-supplier=Ciiva, ComponentLink5Description=https://datasheet.octopart.com:443/GRM155R61H474KE11D-Murata-datasheet-138740827.pdf?src-supplier=Ciiva, ComponentLink5URL=https://datasheet.octopart.com:443/GRM155R61H474KE11D-Murata-datasheet-138740827.pdf?src-supplier=Ciiva, ComponentLink6Description=https://datasheet.octopart.com:443/GRM155R61H474KE11D-Murata-datasheet-118179445.pdf?src-supplier=LCSC, ComponentLink6URL=https://datasheet.octopart.com:443/GRM155R61H474KE11D-Murata-datasheet-118179445.pdf?src-supplier=LCSC, ComponentLink7Description=https://datasheet.octopart.com:443/GRM155R61H474KE11D-Murata-datasheet-99353828.pdf?src-supplier=Future+Electronics, ComponentLink7URL=https://datasheet.octopart.com:443/GRM155R61H474KE11D-Murata-datasheet-99353828.pdf?src-supplier=Future+Electronics, ComponentLink8Description=https://datasheet.octopart.com/GRM155R61H474KE11D-Murata-datasheet-12515295.pdf, ComponentLink8URL=https://datasheet.octopart.com/GRM155R61H474KE11D-Murata-datasheet-12515295.pdf, ComponentLink9Description=https://datasheet.octopart.com/GRM155R61H474KE11D-Murata-datasheet-12510076.pdf, ComponentLink9URL=https://datasheet.octopart.com/GRM155R61H474KE11D-Murata-datasheet-12510076.pdf, ComponentLink10Description=https://datasheet.octopart.com/GRM155R61H474KE11D-Murata-datasheet-11978611.pdf, ComponentLink10URL=https://datasheet.octopart.com/GRM155R61H474KE11D-Murata-datasheet-11978611.pdf, ComponentLink11Description=https://datasheet.octopart.com/GRM155R61H474KE11D-Murata-datasheet-10025737.pdf, ComponentLink11URL=https://datasheet.octopart.com/GRM155R61H474KE11D-Murata-datasheet-10025737.pdf, ComponentLink12Description=https://datasheet.octopart.com/GRM155R61H474KE11D-Murata-datasheet-8819587.pdf, ComponentLink12URL=https://datasheet.octopart.com/GRM155R61H474KE11D-Murata-datasheet-8819587.pdf, ComponentLink13Description=http://sigma.octopart.com:80/reach_statement/Murata-company-16.pdf?src-supplier=Compliance+Statements, ComponentLink13URL=http://sigma.octopart.com:80/reach_statement/Murata-company-16.pdf?src-supplier=Compliance+Statements, Country of Origin=Philippines, Export Control Classification Number (ECCN) Code=EAR99, Harmonized Tariff Schedule (HTS) Code=8532.24.00.20, Height=500µm, Introduction Date=2016-11-30, Length=1mm, Lifecycle Status=Production, Manufacturer Part Number=GRM155R61H474KE11D, Material=Ceramic, Mount="Surface Mount", Number of Terminals=2, Pricing 1="1=0.1, 10=0.05, 50=0.0342, 100=0.0294, 500=0.02144, 1000=0.01897, 2500=0.01639, 5000=0.01484 (USD)", REACH SVHC=Yes, RoHS=Compliant, Schedule B="8532240020, 8532240020|8532240020, 8532240020|8532240020|8532240020, 8532240020|8532240020|8532240020|8532240020", Stock 1=3508, Supplier 1=DigiKey, Thickness=500µm, Voltage Rating (DC)=50V, Width=500µm
D1: "STMicroelectronics USBLC6-2SC6 TVS diode surge protection on full tape reel", Breakdown Voltage=6V, Capacitance=2.5pF, Case/Package=SOT-23, Clamping Voltage=17V, Forward Voltage=1.1V, Leakage Current=150nA, Manufacturer=STMicroelectronics, Max Junction Temperature (Tj)=125°C, Max Repetitive Reverse Voltage (Vrrm)=5.25V, Min Operating Temperature=-40°C, Peak Pulse Current=5A, Power Line Protection=Yes, Reverse Standoff Voltage=5V, Test Current=1mA, Category="TVS Diodes", China RoHS=Compliant, ComponentLink1Description=https://datasheet.octopart.com:443/USBLC6-2SC6-STMicroelectronics-datasheet-10412581.pdf?src-supplier=Newark, ComponentLink1URL=https://datasheet.octopart.com:443/USBLC6-2SC6-STMicroelectronics-datasheet-10412581.pdf?src-supplier=Newark, ComponentLink2Description=https://datasheet.octopart.com:443/USBLC6-2SC6-STMicroelectronics-datasheet-181961833.pdf?src-supplier=Newark, ComponentLink2URL=https://datasheet.octopart.com:443/USBLC6-2SC6-STMicroelectronics-datasheet-181961833.pdf?src-supplier=Newark, ComponentLink3Description=https://datasheet.octopart.com:443/USBLC6-2SC6-STMicroelectronics-datasheet-525477.pdf?src-supplier=Factory+Futures, ComponentLink3URL=https://datasheet.octopart.com:443/USBLC6-2SC6-STMicroelectronics-datasheet-525477.pdf?src-supplier=Factory+Futures, ComponentLink4Description=https://datasheet.octopart.com:443/USBLC6-2SC6-STMicroelectronics-datasheet-82998616.pdf?src-supplier=Farnell, ComponentLink4URL=https://datasheet.octopart.com:443/USBLC6-2SC6-STMicroelectronics-datasheet-82998616.pdf?src-supplier=Farnell, ComponentLink5Description=https://datasheet.octopart.com:443/USBLC6-2SC6-STMicroelectronics-datasheet-46285.pdf?src-supplier=Farnell, ComponentLink5URL=https://datasheet.octopart.com:443/USBLC6-2SC6-STMicroelectronics-datasheet-46285.pdf?src-supplier=Farnell, ComponentLink6Description=https://datasheet.octopart.com:443/USBLC6-2SC6-STMicroelectronics-datasheet-14050643.pdf?src-supplier=iiiC, ComponentLink6URL=https://datasheet.octopart.com:443/USBLC6-2SC6-STMicroelectronics-datasheet-14050643.pdf?src-supplier=iiiC, ComponentLink7Description=https://datasheet.octopart.com:443/USBLC6-2SC6-STMicroelectronics-datasheet-10521292.pdf?src-supplier=Jameco, ComponentLink7URL=https://datasheet.octopart.com:443/USBLC6-2SC6-STMicroelectronics-datasheet-10521292.pdf?src-supplier=Jameco, Contact Plating=Tin, Data Rate=480Mbps, Depth=1.75mm, Direction=Unidirectional, Element Configuration=Dual, ESD Protection=Yes, Height=1.45mm, Lead Free="Lead Free", Length=3.05mm, Lifecycle Status=Production, Manufacturer Part Number=USBLC6-2SC6, Max Breakdown Voltage=6V, Max Operating Temperature=125°C, Max Reverse Leakage Current=150nA, Min Breakdown Voltage=6V, Mount="Surface Mount", Number of Bidirectional Channels=2, Number of Channels=2, Number of Elements=1, Number of Pins=6, Number of Terminals=6, Operating Supply Voltage=1.1V, Peak Reverse Current=150nA, Polarity=Unidirectional, Pricing 1="1=0.36, 10=0.243, 100=0.163, 500=0.127, 1000=0.114 (USD)", Radiation Hardening=No, REACH SVHC=Yes, Reverse Breakdown Voltage=6V, RoHS=Compliant, Schedule B="8536300000, 8536300000|8536300000|8536300000|8536300000|8536300000|8536300000|8536300000|8536300000|8536300000|8536300000|8536300000|8536300000|8536300000|8536300000|8536300000|8536300000|8536300000|8536300000|8536300000|8536300000|8536300000|8536300000|8536300000|85", Stock 1=66064, Supplier 1=DigiKey, Termination=SMD/SMT, Width=1.75mm, Working Voltage=5V
D2 D3 D6: "Trans Voltage Suppressor Diode, 350W, 5V V(RWM), Unidirectional, 1 Element, Silicon", Clamping Voltage=14.5V, Manufacturer="Sangdest Microelectronics", Max Operating Temperature=125°C, Min Breakdown Voltage=6V, Min Operating Temperature=-55°C, Peak Pulse Power=350W, Peak Reverse Current=10µA, Reverse Standoff Voltage=5V, Supplier Part Number 1=1655-SD05CT-ND, Category="TVS Diodes", ComponentLink1Description=https://datasheet.octopart.com:443/SD05-SMC-Diode-Solutions-datasheet-181400473.pdf?src-supplier=IHS, ComponentLink1URL=https://datasheet.octopart.com:443/SD05-SMC-Diode-Solutions-datasheet-181400473.pdf?src-supplier=IHS, Lifecycle Status=Production, Manufacturer Part Number=SD05, Number of Elements=1, Number of Terminals=2, Polarity=Unidirectional, Pricing 1="1=0.27, 10=0.165, 100=0.1025, 500=0.0752, 1000=0.06636 (USD)", REACH SVHC=Yes, RoHS=Compliant, Stock 1=13210, Supplier 1=DigiKey
D4 D5: "SD Series 42 V 7 A 450 W Surface Mount Bidirectional TVS Diode - SOD-323", Breakdown Voltage=26.7V, Capacitance=50pF, Case/Package=SOD, Clamping Voltage=42V, Leakage Current=1µA, Manufacturer=Littelfuse, Max Operating Temperature=125°C, Max Power Dissipation=450W, Max Surge Current=7A, Min Operating Temperature=-40°C, Operating Supply Voltage=24V, Power Line Protection=No, Ratings=AEC-Q101, Supplier Part Number 1=F6446CT-ND, Category="TVS Diodes", ComponentLink1Description=https://datasheet.octopart.com:443/SD24C-01FTG-Littelfuse-datasheet-168252985.pdf?src-supplier=Newark, ComponentLink1URL=https://datasheet.octopart.com:443/SD24C-01FTG-Littelfuse-datasheet-168252985.pdf?src-supplier=Newark, ComponentLink2Description=https://datasheet.octopart.com:443/SD24C-01FTG-Littelfuse-datasheet-32866225.pdf?src-supplier=Newark, ComponentLink2URL=https://datasheet.octopart.com:443/SD24C-01FTG-Littelfuse-datasheet-32866225.pdf?src-supplier=Newark, ComponentLink3Description=https://datasheet.octopart.com:443/SD24C-01FTG-Littelfuse-datasheet-138797050.pdf?src-supplier=ODG+(Origin+Data+Global), ComponentLink3URL=https://datasheet.octopart.com:443/SD24C-01FTG-Littelfuse-datasheet-138797050.pdf?src-supplier=ODG+(Origin+Data+Global), ComponentLink4Description=https://datasheet.octopart.com:443/SD24C-01FTG-Littelfuse-datasheet-78834560.pdf?src-supplier=Farnell, ComponentLink4URL=https://datasheet.octopart.com:443/SD24C-01FTG-Littelfuse-datasheet-78834560.pdf?src-supplier=Farnell, ComponentLink5Description=https://datasheet.octopart.com:443/SD24C-01FTG-Littelfuse-datasheet-42901060.pdf?src-supplier=Fuses+Unlimited, ComponentLink5URL=https://datasheet.octopart.com:443/SD24C-01FTG-Littelfuse-datasheet-42901060.pdf?src-supplier=Fuses+Unlimited, ComponentLink6Description=https://datasheet.octopart.com:443/SD24C-01FTG-Littelfuse-datasheet-173466928.pdf?src-supplier=Future+Electronics, ComponentLink6URL=https://datasheet.octopart.com:443/SD24C-01FTG-Littelfuse-datasheet-173466928.pdf?src-supplier=Future+Electronics, ComponentLink7Description=https://datasheet.octopart.com:443/SD24C-01FTG-Littelfuse-datasheet-137408339.pdf?src-supplier=RS+(Formerly+Allied+Electronics), ComponentLink7URL=https://datasheet.octopart.com:443/SD24C-01FTG-Littelfuse-datasheet-137408339.pdf?src-supplier=RS+(Formerly+Allied+Electronics), Composition=Zener, Depth=1.4mm, Direction=Bidirectional, Element Configuration=Single, Height=1.14mm, Lead Free="Lead Free", Length=1.8mm, Lifecycle Status=Production, Manufacturer Part Number=SD24C-01FTG, Min Breakdown Voltage=26.7V, Mount="Surface Mount", Number of Bidirectional Channels=1, Number of Channels=1, Number of Elements=1, Number of Pins=2, Number of Terminals=2, Peak Pulse Current=7A, Peak Pulse Power=450W, Polarity=Bidirectional, Pricing 1="1=0.66, 10=0.407, 100=0.2598, 500=0.19638, 1000=0.17589 (USD)", Radiation Hardening=No, REACH SVHC=Yes, Reverse Standoff Voltage=24V, RoHS=Compliant, Schedule B="8536300000, 8536300000|8536300000|8536300000|8536300000|8536300000", Stock 1=22762, Supplier 1=DigiKey, Termination=SMD/SMT, Working Voltage=24V